# Altium PCB PCB.PcbDoc (part 1 of 10)
Units mm, origin at the board's own origin, x right, y up, seen from the top; angles counter-clockwise.
Board outline 100.5 x 147.95 mm, 6 copper layers (Top Layer, Layer 2 (GND), Layer 3, Layer 4, Layer 5 (AGND), Bottom Layer), stack 1.449 mm thick; 511 components, 297 nets, 1620 pads, 565 vias.
Unrouted connection lines stored in the file: 597.
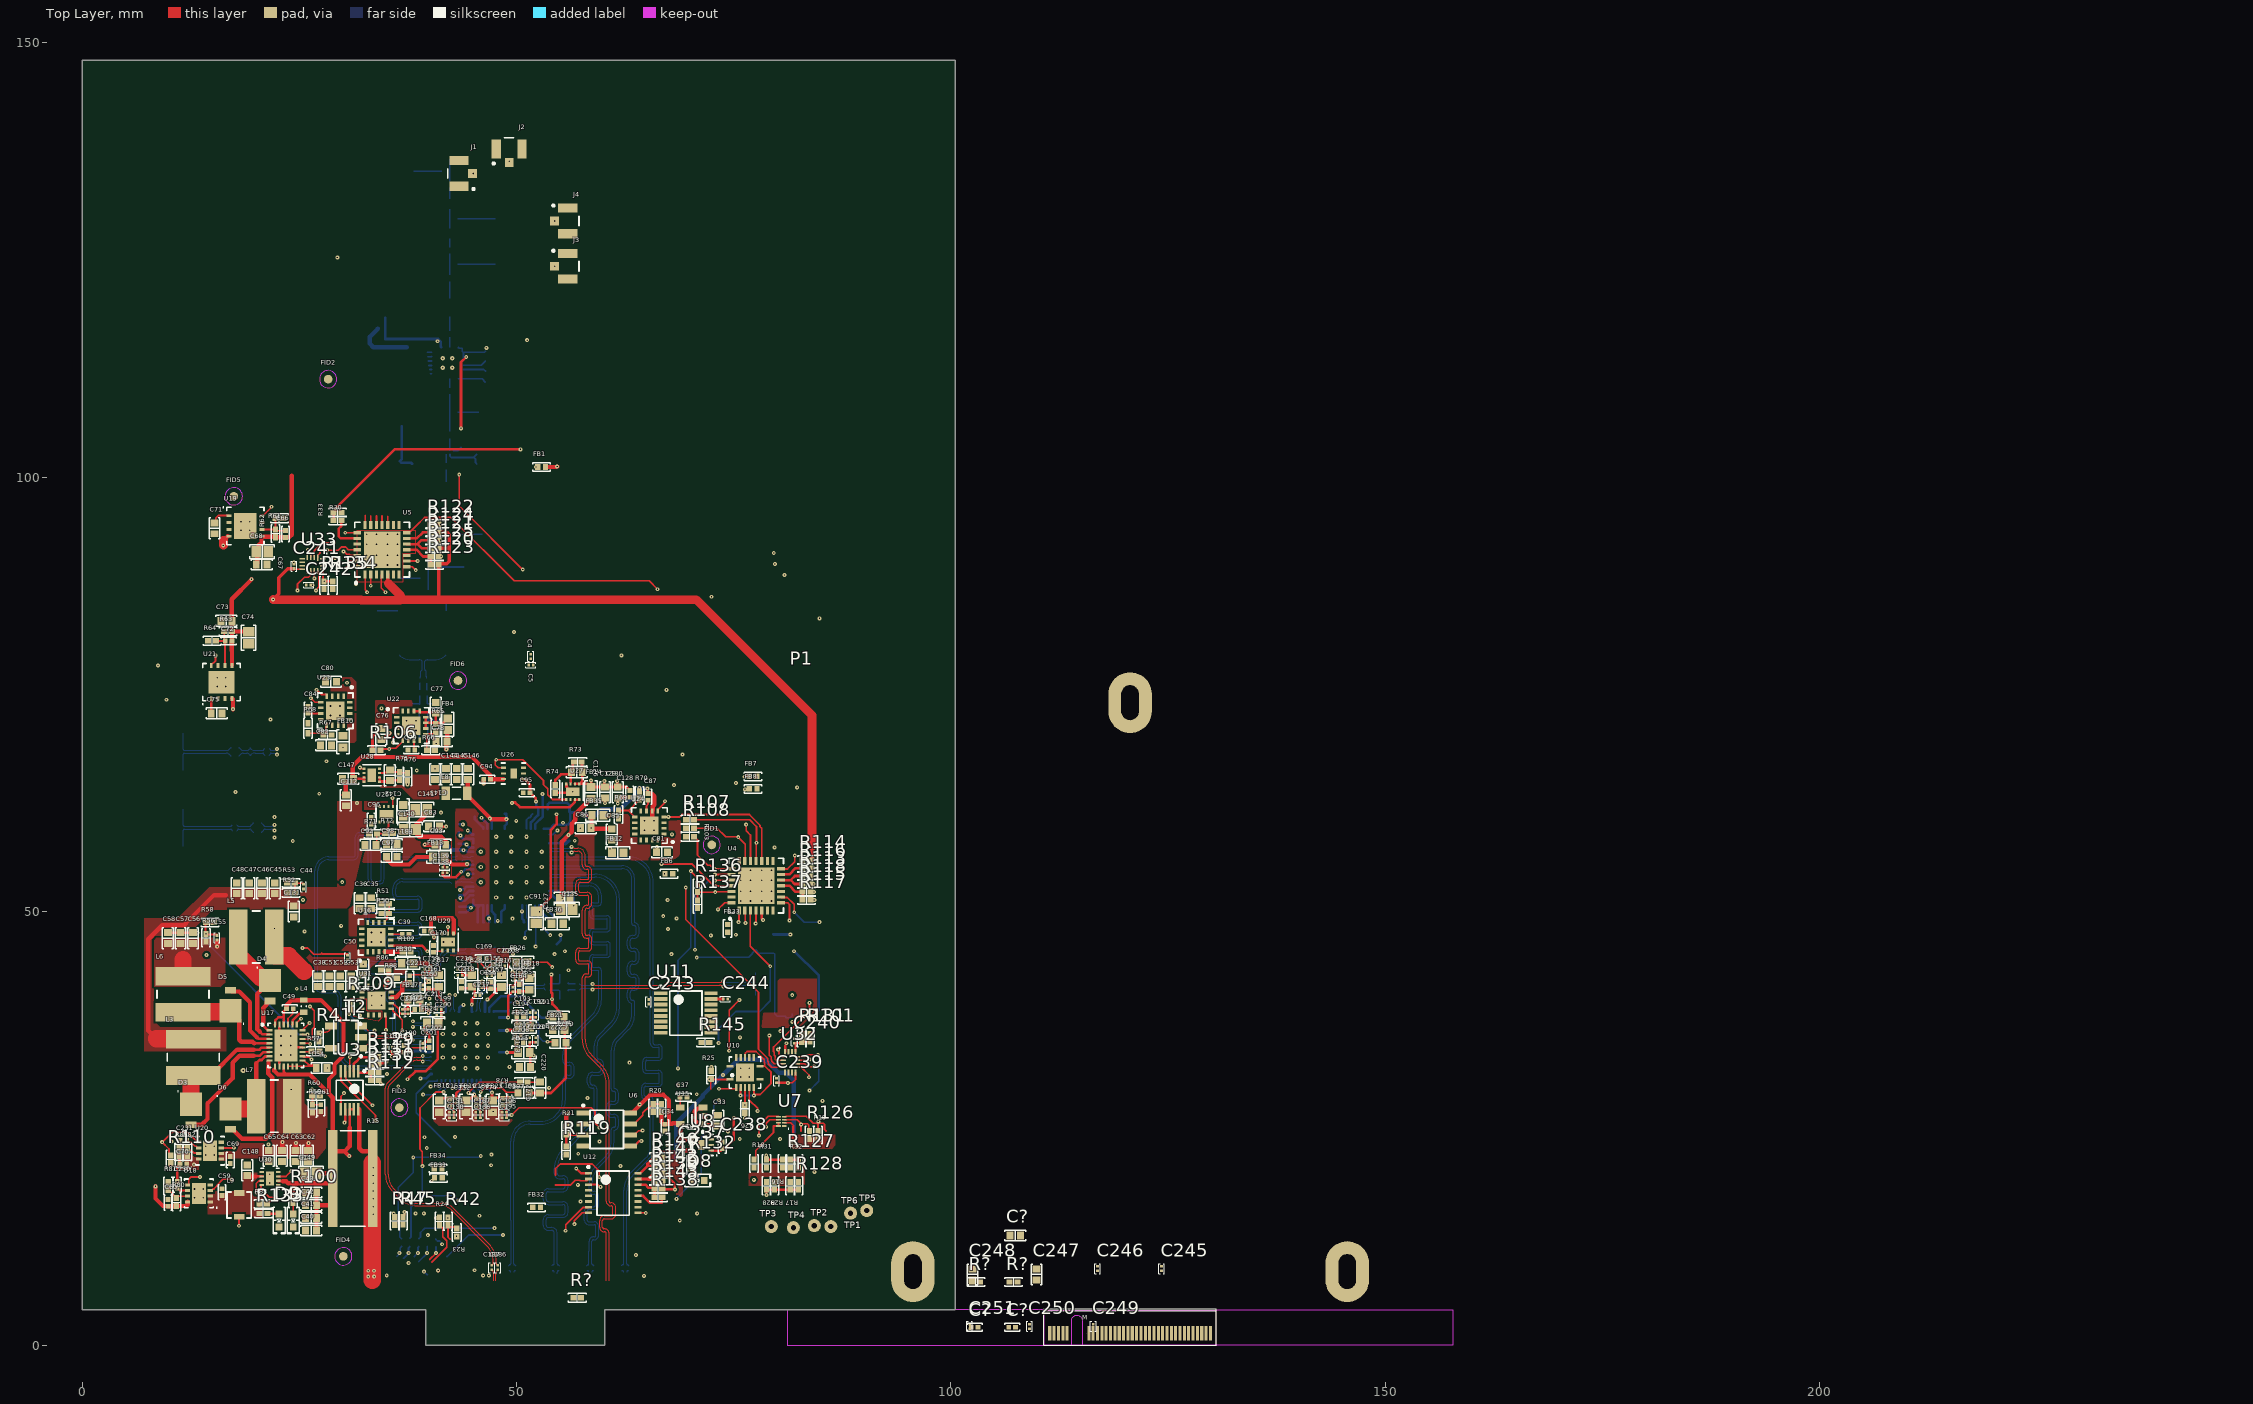
[diagram p0: Top Layer view]
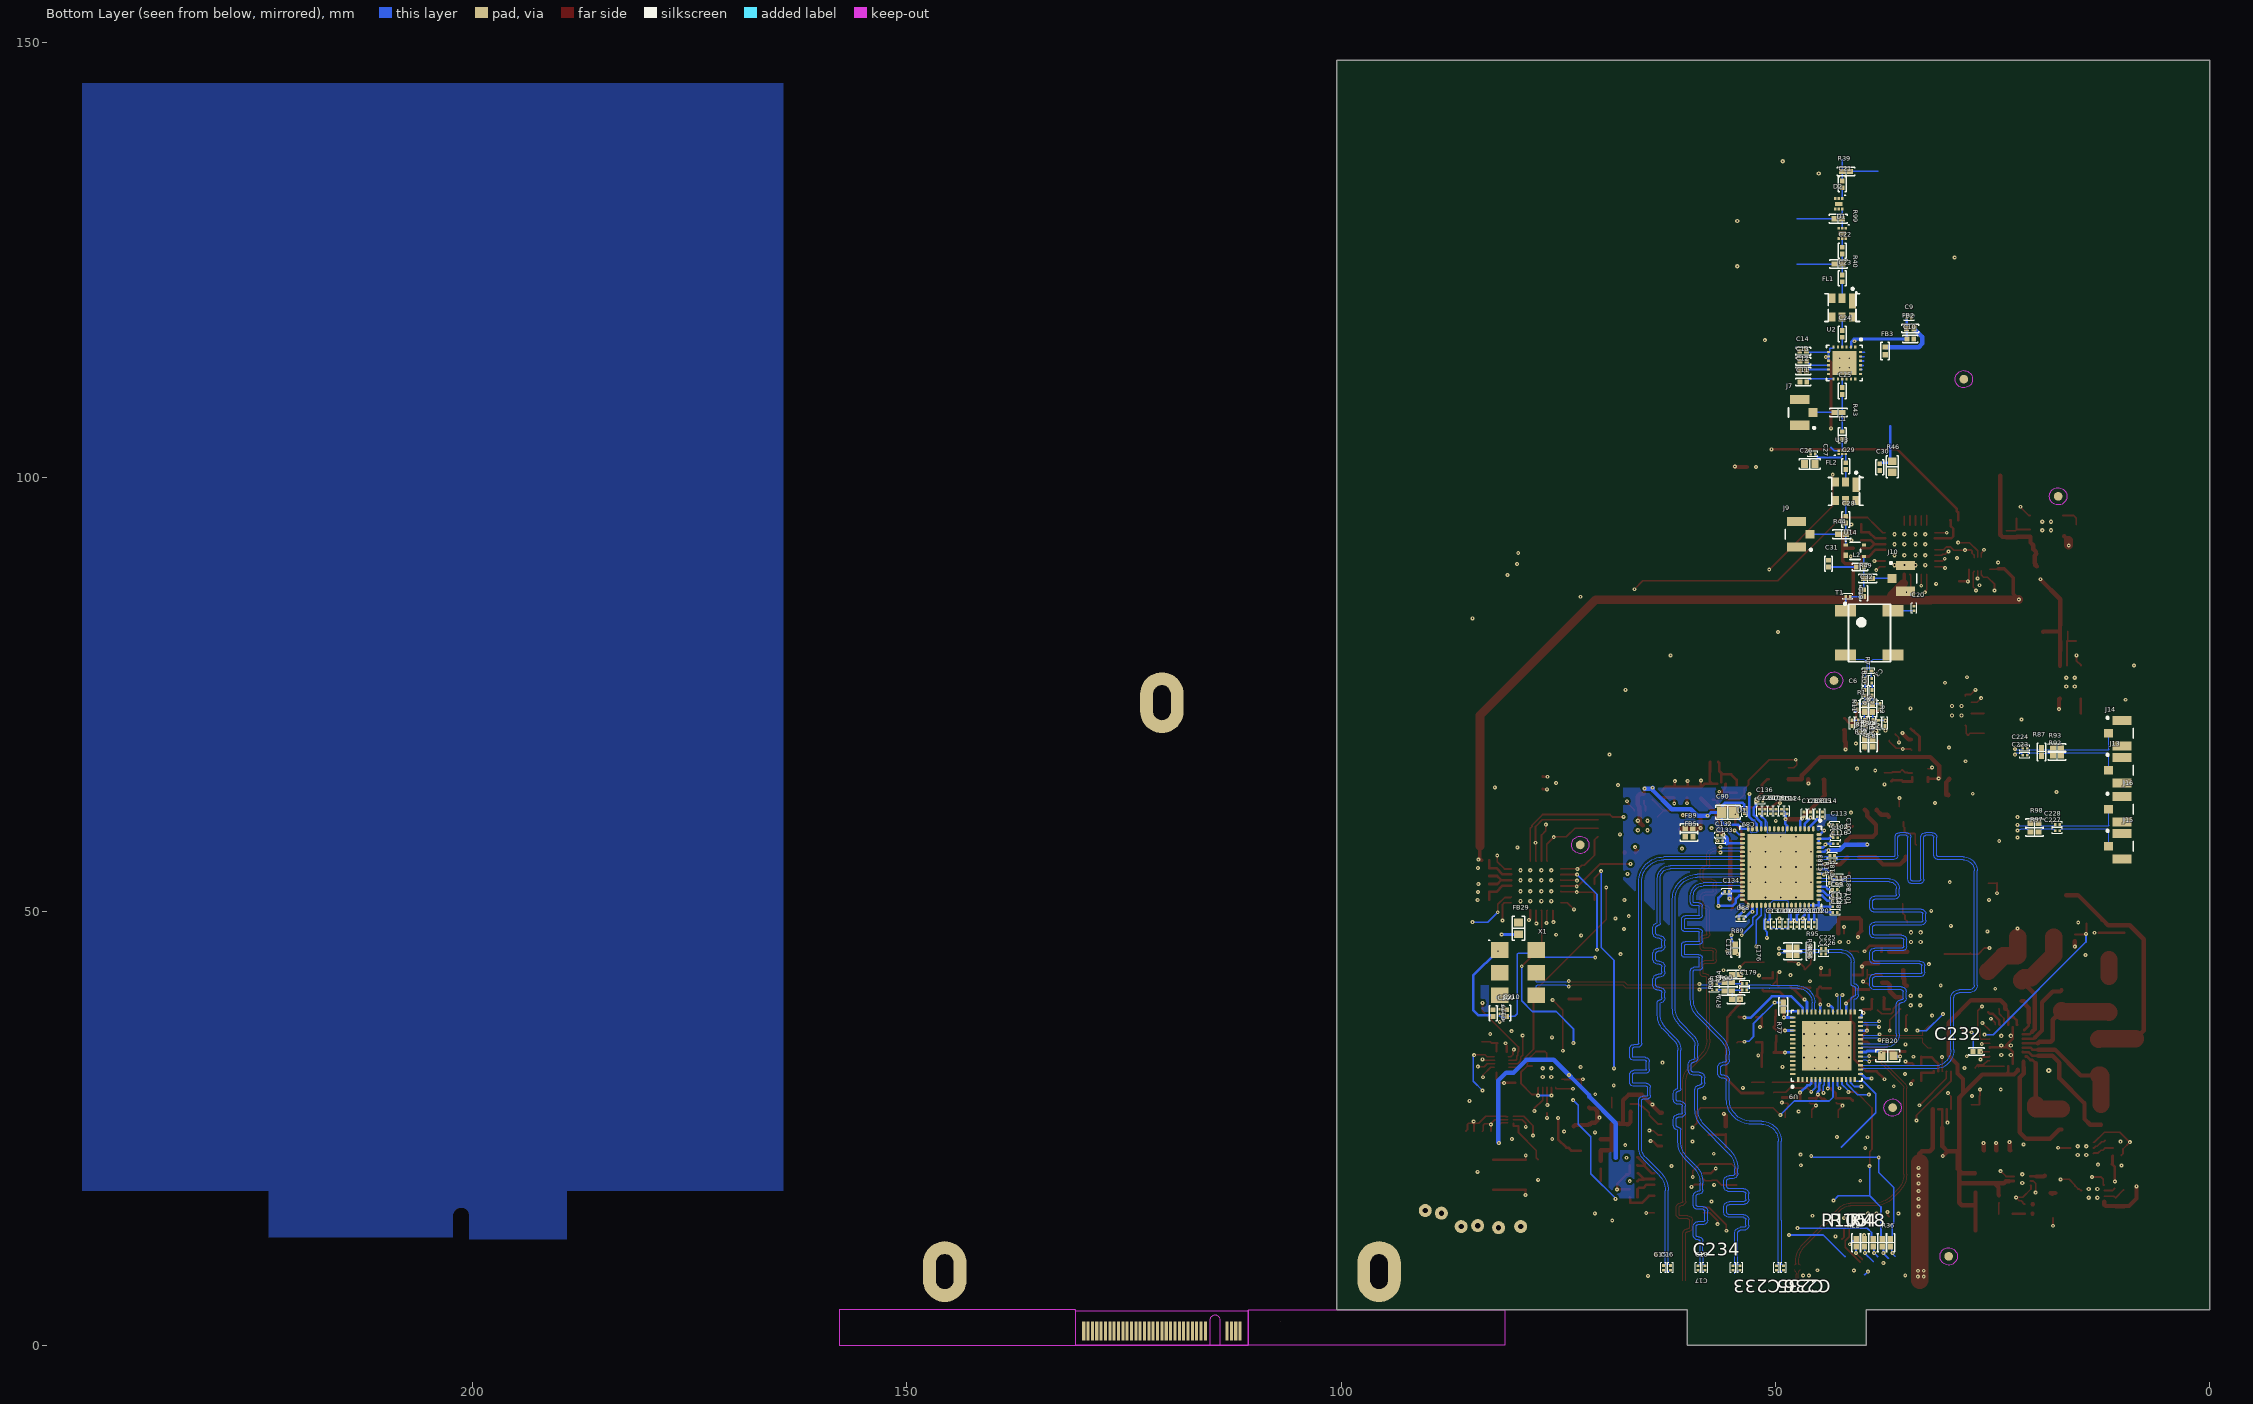
[diagram p1: Bottom Layer view, seen from below]
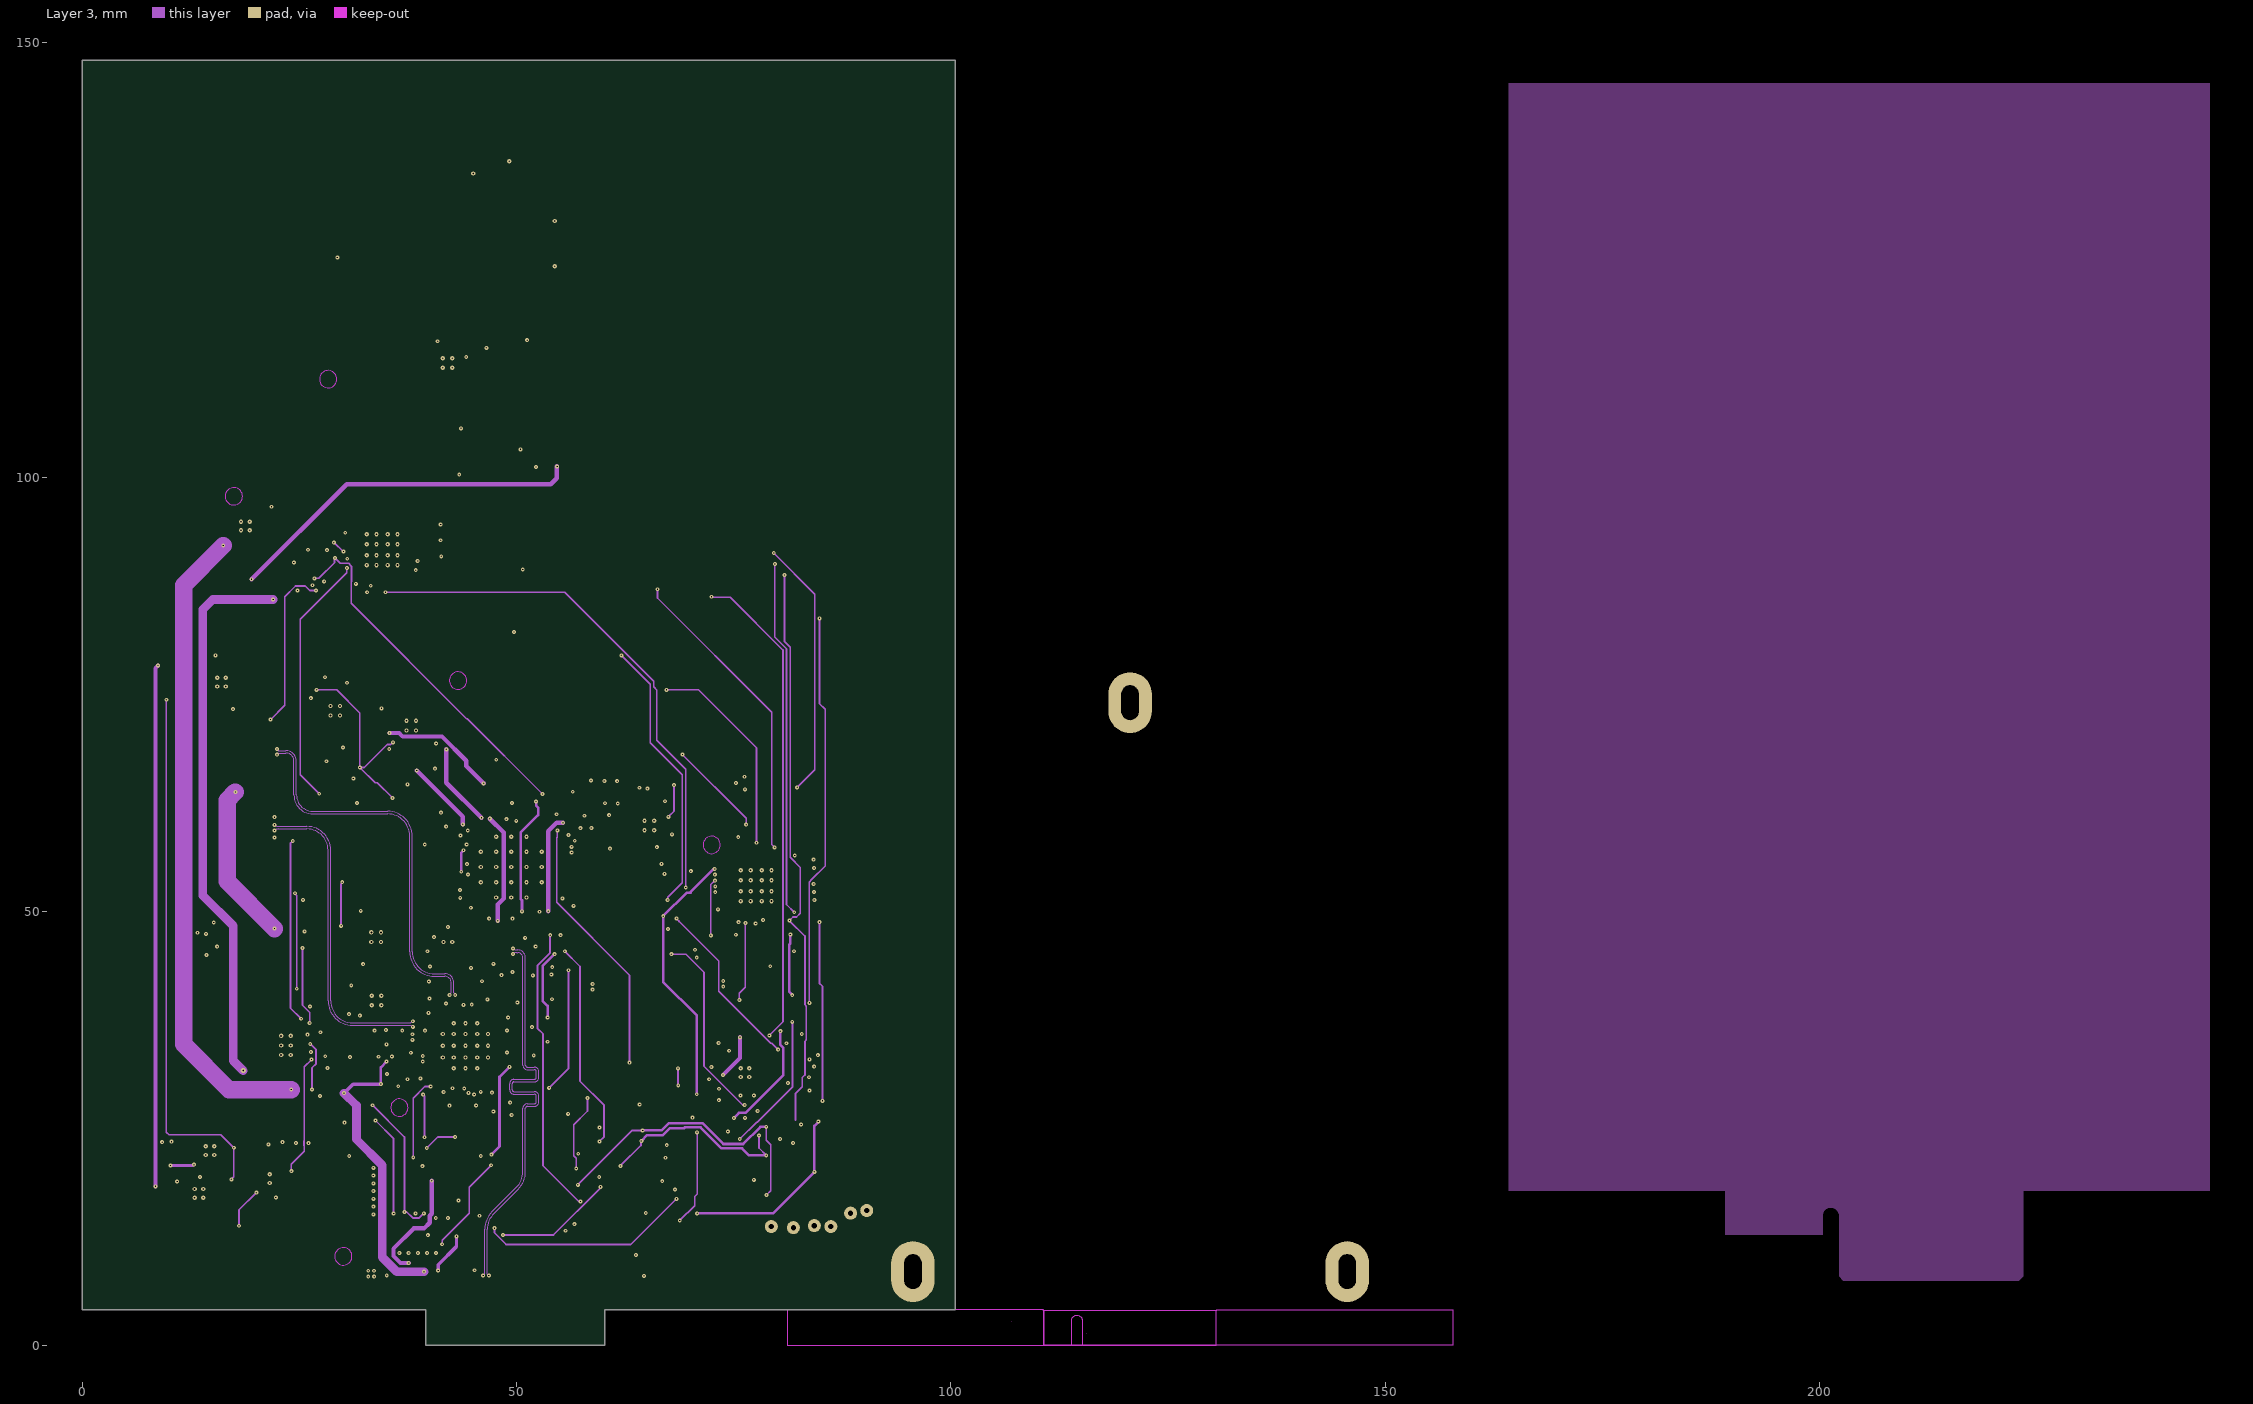
[diagram p2: Layer 3]
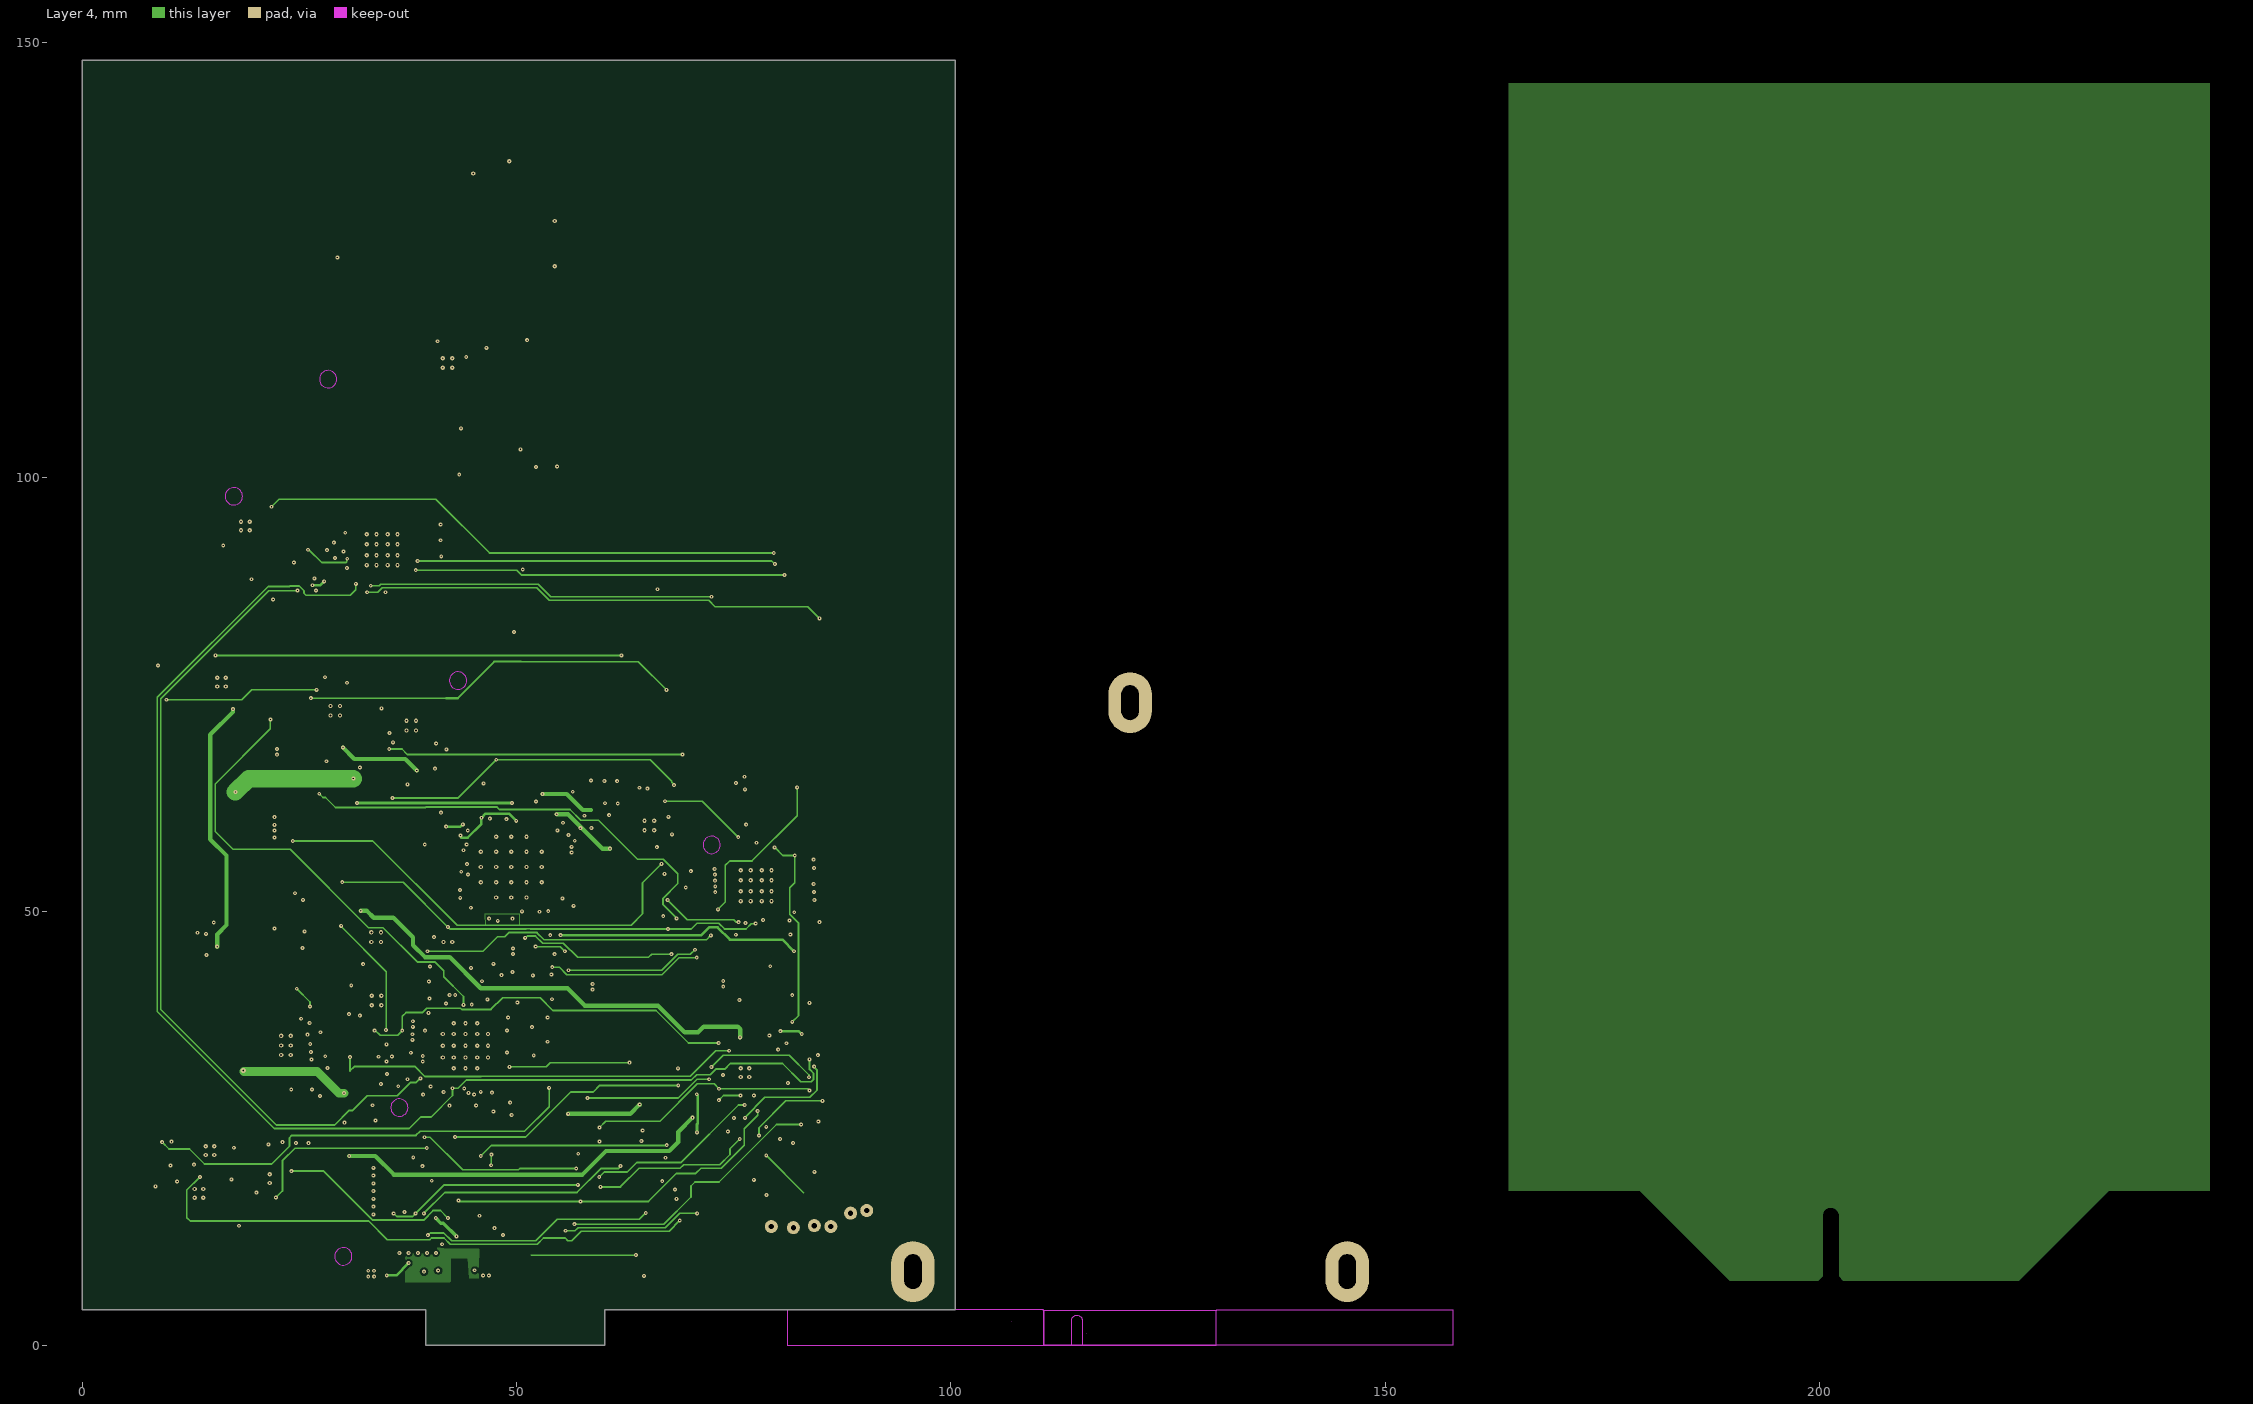
[diagram p3: Layer 4]

## Layer stack, top to bottom
Top Solder: solder mask 0.02, SM-001, Dk 4
Top Layer: signal copper 0.018
Dielectric 1: prepreg 0.105, PP-016, Dk 4.4
Layer 2 (GND): signal copper 0.0044
Dielectric 3: core 0.5, Core-035, Dk 4.7
Layer 3: signal copper 0.0044
Dielectric 5: prepreg 0.185, PP-021, Dk 4.7
Layer 4: signal copper 0.0044
Dielectric 6: core 0.5, Core-035, Dk 4.7
Layer 5 (AGND): signal copper 0.0044
Dielectric 7: prepreg 0.105, PP-016, Dk 4.4
Bottom Layer: signal copper 0.018
Bottom Solder: solder mask 0.02, SM-001, Dk 4

## Board outline
0,148 100.5,148 100.5,4.15 60.171,4.15 60.171,0.05 39.525,0.05 39.525,4.15 0,4.15

## Design rules (kind name [scope] priority, off if disabled: settings)
Clearance [All] p1: gap=0.254 ignorepadtopadclearanceinfootprint=FALSE except(0: Arc-Hole Track-Hole SMDPad-Hole THPad-Hole Via-Hole Fill-Hole Poly-Hole Region-Hole Text-Hole)
DiffPairsRouting [All] p1: maxlimit=0.127 minlimit=0.05 mostfreqgap=0.127 toplayer_mingap=0.127 toplayer_maxgap=0.127 toplayer_minwidth=0.112 toplayer_maxwidth=0.137 toplayer_prefwidth=0.118 midlayer1_prefgap=0.05 midlayer1_minwidth=0.055 midlayer1_maxwidth=0.055 midlayer1_prefwidth=0.055 midlayer2_prefgap=0.05 midlayer2_minwidth=0.055 midlayer2_maxwidth=0.055 midlayer2_prefwidth=0.055 midlayer3_mingap=0.127 midlayer3_maxgap=0.127 midlayer3_minwidth=0.098 midlayer3_maxwidth=0.098 midlayer3_prefwidth=0.098 midlayer4_mingap=0.127 midlayer4_maxgap=0.127 midlayer4_minwidth=0.098 midlayer4_maxwidth=0.098 midlayer4_prefwidth=0.098 bottomlayer_mingap=0.127 bottomlayer_maxgap=0.127 bottomlayer_minwidth=0.112 bottomlayer_maxwidth=0.137 bottomlayer_prefwidth=0.118 substack1={4A79DAF0-92DA-4A0B-BB84-FA68C2F6F527} impedanceprofiledriven=TRUE impedanceprofileid={51EBFF2B-E4F5-483F-9850-5D39397362C8} impedanceprofilevalue=100.000000 maxuncoupledlength=12.7
PlaneConnect [All] p1: planeconnectstyle=Direct reliefexpansion=0.508 reliefentries=4 reliefconductorwidth=0.254 reliefairgap=0.254
PolygonConnect [All] p1: connectstyle=Direct reliefconductorwidth=0.254 reliefentries=4 polygonreliefangle="90 Angle" airgapwidth=0.254
RoutingVias [All] p1: holewidth=0.711 width=1.27 viastyle="Through Hole" minholewidth=0.711 minwidth=1.27 maxholewidth=0.711 maxwidth=1.27
SolderMaskExpansion [All] p1: expansion=0.102 istentingtop=FALSE
Width [All] p1: maxlimit=0.254 minlimit=0.254 preferedwidth=0.254
28 further rules are at their usual default settings.

## Classes and differential pairs
differential pair class Diff100: ADC_CLK9690 AN_IN AN_IN_9690 CLKin0 CLKin0_1 CLKin1 CLKin1_1 CLKout1 CLKout2 CLKout3 CLKout4 CLKout5 LMK_CLKin0 LMK_CLKin1 O1 O2 O5 O5P OSCIN VCXO_OUT
differential pair class Diff100CtoConn: O2 PER0 PER1 PER2 PER3 PET1 PET2 PET3
differential pair class Diff100ADCtoC: CMLout1 CMLout2 CMLout3 CMLout4
net class Single50Ohm: AGND AN_IN_N AN_IN_P CLKin0_1_N CLKin0_1_P CLKin0_N CLKin0_P CLKin1_1_N CLKin1_1_P LMK_CLKin0_N LMK_CLKin0_P LMK_CLKin1_N LMK_CLKin1_P NetC1_1 NetC2_1 NetC3_2 NetC4_2 NetC5_1 NetC5_2 NetC6_2 NetC7_2 NetC8_2 NetC21_1 NetC21_2 NetC22_1 NetC22_2 NetC23_2 NetC24_1 NetC24_2 NetC25_1 NetC25_2 NetC28_1 NetC28_2 NetC29_1 NetC29_2 NetC32_2 NetC175_2 NetC176_1 NetC178_2 NetC179_1 NetC209_2 NetC232_1 NetC232_2 NetD1_2 NetJ1_2 NetJ3_2 NetJ4_2 NetJ7_2 NetJ9_2 NetJ10_2 NetL1_1 NetR1_2 NetR9_1 Tor_RF_50 TorRF_50 TorRF_50_1 VCXO_OUT_N VCXO_OUT_P
net class JTAG[1..5]: JTAG1 JTAG2 JTAG3 JTAG4 JTAG5
net class Dlugosc: CMLout1_N CMLout1_P CMLout2_N CMLout2_P CMLout3_N CMLout3_P CMLout4_N CMLout4_P
net class Dlugosc_sync: PET3_N PET3_P
net class Dlugosc_3: CLKout2_N CLKout3_N CLKout3_P
net class Dlugosc_2: LMK_CLKin1_N LMK_CLKin1_P
net class Dlugosc_1: CLKin1_N CLKin1_P
net class Dlugosc4: CLKout1_N CLKout1_P CLKout2_P
net class CtoConn: O2_N O2_P PER0_N PER0_P PER1_N PER1_P PER2_N PER2_P PER3_N PER3_P PET1_N PET1_P PET2_N PET2_P PET3_N PET3_P
net class CLKDisToC: CLKout1_N CLKout1_P CLKout2_N CLKout2_P CLKout3_N CLKout3_P CLKout5_N CLKout5_P
net class CLK_Out: CLKout1_N CLKout1_P CLKout2_N CLKout2_P CLKout3_N CLKout3_P CLKout5_N CLKout5_P
net class CLK_O: ADC_CLK9690_N ADC_CLK9690_P O1_N O1_P O2_N O2_P O5_N O5_P
net class CLK_IN2: LMK_CLKin0_N LMK_CLKin0_P LMK_CLKin1_N LMK_CLKin1_P
net class CLK_IN1: CLKin0_N CLKin0_P CLKin1_N CLKin1_P
net class Ain: AN_IN_9690_N AN_IN_9690_P
net class ADC_CLK: ADC_CLK9690_N ADC_CLK9690_P O1_N O1_P O2_N O2_P O5_N O5_P
component class U_Zegar: C171 C172 C173 C175 C176 C177 C178 C179 C183 C185 C186 C187 C188 C189 C222 C223 C224 C225 C226 C227 C228 C232 FB21 J13 J14 J15 J16 R41 R77 R78 R79 R84 R87 R89 R90 R91 R92 R93 R94 R95 R96 R97 R98 T2 X1
component class U_Zasilanie: C33 C34 C35 C36 C37 C38 C39 C40 C41 C42 C43 C45 C46 C47 C48 C49 C51 C52 C53 C54 C55 C56 C57 C58 C59 C60 C61 C62 C63 C64 C65 C66 C67 C68 C69 C70 C71 C72 C73 C74 C75 C148 C149 C230 C231 C237 C238 C245 C246 C247 C248 D3 D4 D5 D6 D7 D8 D9 FB31 FB32 FB33 FB34 L3 L4 L5 L6 L7 L9 R50 R51 R52 R53 R56 R57 R58 R59 R60 R61 R62 R63 R64 R80 R81 R82 R85 R100 R102 R103 R110 R132 R133 R? U8 U15 U16 U17 U18 U19 U20 U21 U30
component class U_Zasilanie_LMK: C150 C151 C152 C153 C154 C155 C156 C157 C158 C159 C160 C161 C162 C163 C164 C165 C166 C167 C168 C169 C170 C174 C180 C181 C182 C184 C190 C191 C192 C193 C194 C195 C196 C197 C198 C199 C200 C201 C202 C203 C204 C205 C206 C207 C208 C209 C210 C211 C212 C213 C214 C215 C216 C217 C218 C219 C220 C221 C? FB15 FB16 FB17 FB18 FB19 FB20 FB22 FB23 FB24 FB25 FB26 FB27 FB28 FB29 FB30 R86 R88 R109 R? U9 U29 U31
component class U_Zasilanie_ADC: C76 C77 C78 C79 C80 C81 C82 C83 C84 C85 C86 C87 C88 C89 C90 C91 C92 C93 C94 C95 C96 C97 C98 C99 C100 C101 C102 C103 C104 C105 C106 C107 C108 C109 C110 C111 C112 C113 C114 C115 C116 C117 C118 C119 C120 C121 C122 C123 C124 C125 C126 C127 C128 C129 C130 C131 C132 C133 C134 C135 C136 C137 C138 C139 C140 C141 C142 C143 C144 C145 C146 C147 C229 FB4 FB5 FB6 FB7 FB8 FB9 FB10 FB11 FB12 FB13 FB14 FB35 FB36 L8 R32 R65 R66 R67 R68 R69 R70 R71 R72 R73 R74 R75 R76 R106 R107 R108 U1 U22 U23 U24 U25 U26 U27 U28
component class U_Tor: C19 C20 FB1 FB2 FB3 T1
component class U_TorGnss: C23 C24 C25 C26 C27 C28 C29 C30 C31 C32 FL1 FL2 J7 J9 J10 L1 L2 R43 R44 R46 R49 U13 U14
component class "U_Tor antenowy": C21 C22 D1 D2 J1 J2 J3 J4 R39 R40 R99
component class "U_Pomiar prądu i napięcia": C44 R15 R83 R111 R112 R129 R130 U3
component class U_Komunikacja: C15 C16 C17 C18 C233 C234 C235 C236 C243 C244 C249 C250 C251 R16 R17 R18 R19 R22 R23 R24 R25 R26 R28 R29 R31 R36 R42 R45 R47 R48 R104 R105 R126 R127 R128 R138 R139 R140 R141 R142 R143 R145 TP1 TP2 TP3 TP4 TP5 TP6 U7 U10 U11 U12
component class U_Flash: C50 R20 R21 R27 R119 U6
component class U_Expander: C239 C240 C241 C242 C? R30 R33 R101 R113 R114 R115 R116 R117 R118 R120 R121 R122 R123 R124 R125 R131 R134 R135 R136 R137 U4 U5 U32 U33
component class U_CON_PCI_Express_X4_64PIN: P1
component class U_ATT: C9 C10 C11 C12 C13 C14 U2
component class U_ADC: C1 C2 C3 C4 C5 C6 C7 C8 R1 R2 R3 R4 R5 R6 R7 R8 R9 R10 R11 R12 R13 R14
component class Karta_Radiowa: FID1 FID2 FID3 FID4 FID5 FID6
net class Diff100: ADC_CLK9690_N ADC_CLK9690_P AGND AN_IN_9690_N AN_IN_9690_P AN_IN_N AN_IN_P CLKin0_N CLKin0_P CLKin1_N CLKin1_P CLKout1_N CLKout1_P CLKout2_N CLKout2_P CLKout3_N CLKout3_P CLKout4_N CLKout4_P CLKout5_N CLKout5_P LMK_CLKin0_N LMK_CLKin0_P LMK_CLKin1_N LMK_CLKin1_P LMK_CLKsel NetC209_2 O1_N O1_P O2_N O2_P O5_N O5_P O5P_N O5P_P OSCIN_N OSCIN_P VCXO_OUT_N VCXO_OUT_P
net class Power_LINE: 1.8V_SPI_ADC 5V 12V 4610_FINE_V 9690_AGND_SR +12V AGND AVDD1_1.25V AVDD1_SR_1.25V AVDD2_2.5V AVDD3_3.3V CLK_GND CTRL_VCXO DGND DRGND DRVDD_1.25V DVDD_1.25V GND GND_VCXO NetC66_2 NetC72_2 NetC77_2 NetC82_2 NetC85_2 NetC92_2 NetC126_2 NetC142_2 NetC177_2 NetC209_2 NetC219_2 NetD3_1 NetD3_2 NetD4_1 NetD4_2 NetD5_1 NetD5_2 NetD6_1 NetD6_2 V2.5 V3.7 V5.5 V_LMK_1.8V VCC VCC_5_ATT VCC_AMP_5 VCC_PCA VDD_CORE VDD_IO VDD_OSC VDD_PLL1 VDD_PLL2CORE VDD_PLL2OSC VDDO_1/2 VDDO_3/4 VDDO_5 VDDO_6 VDDO_7/8 VDDO_9/10 VP3.3 Vsup_ADC1 Vsup_ADC2
differential pair VCXO_OUT: +VCXO_OUT_P -VCXO_OUT_N
differential pair PET3: +PET3_P -PET3_N
differential pair PET2: +PET2_P -PET2_N
differential pair PET1: +PET1_P -PET1_N
differential pair PER3: +PER3_P -PER3_N
differential pair PER2: +PER2_P -PER2_N
differential pair PER1: +PER1_P -PER1_N
differential pair PER0: +PER0_P -PER0_N
differential pair OSCIN: +OSCIN_P -OSCIN_N
differential pair O5: +O5_P -O5_N
differential pair O5P: +O5P_P -O5P_N
differential pair O2: +O2_P -O2_N
differential pair O1: +O1_P -O1_N
differential pair LMK_CLKin1: +LMK_CLKin1_P -LMK_CLKin1_N
differential pair LMK_CLKin0: +LMK_CLKin0_P -LMK_CLKin0_N
differential pair CMLout4: +CMLout4_P -CMLout4_N
differential pair CMLout3: +CMLout3_P -CMLout3_N
differential pair CMLout2: +CMLout2_P -CMLout2_N
differential pair CMLout1: +CMLout1_P -CMLout1_N
differential pair CLKout5: +CLKout5_P -CLKout5_N
differential pair CLKout4: +CLKout4_P -CLKout4_N
differential pair CLKout3: +CLKout3_P -CLKout3_N
differential pair CLKout2: +CLKout2_P -CLKout2_N
differential pair CLKout1: +CLKout1_P -CLKout1_N
differential pair CLKin1: +CLKin1_P -CLKin1_N
differential pair CLKin1_1: +CLKin1_1_P -CLKin1_1_N
differential pair CLKin0: +CLKin0_P -CLKin0_N
differential pair CLKin0_1: +CLKin0_1_P -CLKin0_1_N
differential pair AN_IN: +AN_IN_P -AN_IN_N
differential pair AN_IN_9690: +AN_IN_9690_P -AN_IN_9690_N
differential pair ADC_CLK9690: +ADC_CLK9690_P -ADC_CLK9690_N

## Components (designator, comment, footprint, x,y, rotation, side; value= is the part's Value field where it differs from the comment)
C1 "4pF" "CAP 0201/0603 RF" 38.072,71.786 r270 bottom
C2 "1pF" "CAP 0201/0603 RF" 38.529,70.674 r180 bottom
C3 "100nF" "CAP 0201/0603 RF" 38.91,76.573 r270 bottom
C4 "100nF" "CAP 0201/0603 RF" 51.625,79.385 r90 top
C5 "1pF" "CAP 0201/0603 RF" 51.64,78.375 r180 top
C6 "100nF" "CAP 0201/0603 RF" 39.647,76.573 r270 bottom
C7 "4pF" "CAP 0201/0603 RF" 40.46,71.792 r90 bottom
C8 "1pF" "CAP 0201/0603 RF" 40.002,70.674 r180 bottom
C9 "100nF" "CAP 0201/0603 RF" 34.596,118.336 r0 bottom
C10 "10uF" "CAP 0402/1005 RF" 34.468,115.911 r0 bottom
C11 "330pF" "CAP 0402/1005 RF" 46.787,110.958 r0 bottom
C12 "330pF" "CAP 0402/1005 RF" 46.796,112.228 r0 bottom
C13 "330pF" "CAP 0402/1005 RF" 46.787,113.371 r0 bottom
C14 "330pF" "CAP 0402/1005 RF" 46.796,114.514 r0 bottom
C15 "100nF" "CAP 0201/0603 RF" 62.889,8.988 r270 bottom
C16 "100nF" "CAP 0201/0603 RF" 62.076,8.988 r270 bottom
C17 "100nF" "CAP 0201/0603 RF" 58.901,8.982 r270 bottom
C18 "100nF" "CAP 0201/0603 RF" 58.088,8.982 r270 bottom
C19 "100nF" "CAP 0201/0603 RF" 41.648,86.271 r0 bottom
C20 "100nF" "CAP 0201/0603 RF" 34.033,84.898 r270 bottom
C21 "22pF" "CAP 0402/1005 RF" 42.307,133.716 r270 bottom
C22 "22pF" "CAP 0402/1005 RF" 42.308,126.093 r270 bottom
C23 "33pF" "CAP 0402/1005 RF" 42.308,122.896 r270 bottom
C24 "33pF" "CAP 0402/1005 RF" 42.3,116.499 r270 bottom
C25 "33pF" "CAP 0402/1005 RF" 42.3,109.933 r270 bottom
C26 "2.2uF" "CAP 0603/1608 RF" 46.037,101.52 r180 bottom
C27 "100nF" "CAP 0201/0603 RF" 45.678,102.662 r180 bottom
C28 "33pF" "CAP 0402/1005 RF" 41.9,95.133 r90 bottom
C29 "33pF" "CAP 0402/1005 RF" 41.908,101.272 r90 bottom
C30 "33pF" "CAP 0402/1005 RF" 37.973,101.154 r90 bottom
C31 "33pF" "CAP 0402/1005 RF" 43.875,90.056 r270 bottom
C32 "33pF" "CAP 0402/1005 RF" 39.808,86.661 r90 bottom
C33 "1uF" "CAP 0603/1608 RF" 73.201,25.923 r270 top
C34 "2.2uF" "CAP 0402/1005 RF" 67.08,25.136 r90 top
C35 "4.7uF" "CAP 0603/1608 RF" 33.272,50.968 r270 top
C36 "4.7uF" "CAP 0603/1608 RF" 31.926,50.968 r270 top
C37 "100pF" "CAP 0402/1005 RF" 69.212,28.62 r180 top
C38 "4.7uF" "CAP 0603/1608 RF" 27.131,41.977 r90 top
C39 "1nF" "CAP 0402/1005 RF" 37.209,47.386 r180 top
C40 "4.7uF" "CAP 0603/1608 RF" 26.339,13.281 r180 top
C41 "4.7uF" "CAP 0603/1608 RF" 26.339,14.739 r180 top
C42 "4.7uF" "CAP 0603/1608 RF" 26.339,16.191 r180 top
C43 "4.7uF" "CAP 0603/1608 RF" 26.339,17.653 r180 top
C44 "100nF" "CAP 0201/0603 RF" 25.474,52.864 r270 top
C45 "4.7uF" "CAP 0603/1608 RF" 22.146,52.686 r270 top
C46 "4.7uF" "CAP 0603/1608 RF" 20.68,52.686 r270 top
C47 "4.7uF" "CAP 0603/1608 RF" 19.214,52.686 r270 top
C48 "4.7uF" "CAP 0603/1608 RF" 17.776,52.686 r270 top
C49 "1uF" "CAP 0402/1005 RF" 23.886,38.801 r180 top
C50 "100nF" "CAP 0201/0603 RF" 30.516,44.712 r270 top
C51 "4.7uF" "CAP 0603/1608 RF" 28.446,41.976 r90 top
C52 "4.7uF" "CAP 0603/1608 RF" 29.691,41.976 r90 top
C53 "4.7uF" "CAP 0603/1608 RF" 30.961,41.976 r90 top
C54 "100nF" "CAP 0603/1608 RF" 27.557,31.994 r180 top
C55 "82pF" "CAP 0201/0603 RF" 15.5,46.982 r270 top
C56 "4.7uF" "CAP 0603/1608 RF" 12.747,46.941 r270 top
C57 "4.7uF" "CAP 0603/1608 RF" 11.308,46.941 r270 top
C58 "4.7uF" "CAP 0603/1608 RF" 9.847,46.941 r270 top
C59 "4.7uF" "CAP 0402/1005 RF" 16.074,17.698 r270 top
C60 "4.7uF" "CAP 0402/1005 RF" 9.865,16.466 r270 top
C61 "22pF" "CAP 0402/1005 RF" 27.448,27.38 r270 top
C62 "4.7uF" "CAP 0603/1608 RF" 25.979,21.869 r90 top
C63 "4.7uF" "CAP 0603/1608 RF" 24.539,21.869 r90 top
C64 "4.7uF" "CAP 0603/1608 RF" 22.976,21.869 r90 top
C65 "4.7uF" "CAP 0603/1608 RF" 21.459,21.869 r90 top
C66 "680pF" "CAP 0402/1005 RF" 23.387,93.465 r270 top
C67 "1uF" "CAP 0603/1608 RF" 20.648,89.957 r180 top
C68 "10uF" "CAP 0805/2012 RF" 20.699,91.43 r180 top
C69 "4.7uF" "CAP 0402/1005 RF" 17.03,21.4 r90 top
C70 "4.7uF" "CAP 0402/1005 RF" 11.637,20.932 r0 top
C71 "10nF" "CAP 0603/1608 RF" 15.213,94.122 r90 top
C72 "1.5nF" "CAP 0402/1005 RF" 16.845,81.14 r0 top
C73 "4.7uF" "CAP 0603/1608 RF" 16.585,83.464 r0 top
C74 "10uF" "CAP 0805/2012 RF" 19.15,81.519 r90 top
C75 "10nF" "CAP 0603/1608 RF" 15.467,72.812 r180 top
C76 "4.7uF" "CAP 0603/1608 RF" 34.427,70.429 r90 top
C77 "4.7uF" "CAP 0603/1608 RF" 40.694,73.454 r270 top
C78 "4.7uF" "CAP 0603/1608 RF" 41.361,69.58 r0 top
C79 "1nF" "CAP 0402/1005 RF" 37.878,68.607 r0 top
C80 "4.7uF" "CAP 0603/1608 RF" 28.621,76.463 r0 top
C81 "4.7uF" "CAP 0603/1608 RF" 66.734,56.835 r180 top
C82 "4.7uF" "CAP 0603/1608 RF" 28.065,69.136 r0 top
C83 "4.7uF" "CAP 0603/1608 RF" 40.496,59.807 r0 top
C84 "1nF" "CAP 0402/1005 RF" 25.982,73.218 r270 top
C85 "4.7uF" "CAP 0603/1608 RF" 60.958,58.867 r270 top
C86 "4.7uF" "CAP 0603/1608 RF" 57.961,59.604 r180 top
C87 "1nF" "CAP 0402/1005 RF" 65.124,63.211 r270 top
C88 "100nF" "CAP 0201/0603 RF" 53.922,49.139 r180 bottom
C89 "100nF" "CAP 0201/0603 RF" 53.567,61.515 r270 bottom
C90 "10uF" "CAP 0805/2012 RF" 55.461,61.433 r180 bottom
C91 "10uF" "CAP 0805/2012 RF" 52.246,49.342 r90 top
C92 "2.2nF" "CAP 0603/1608 RF" 33.171,57.673 r180 top
C93 "4.7uF" "CAP 0603/1608 RF" 41.212,57.699 r0 top
C94 "470nF" "CAP 0402/1005 RF" 46.607,65.249 r0 top
C95 "470nF" "CAP 0402/1005 RF" 51.154,63.693 r0 top
C96 "1uF" "CAP 0402/1005 RF" 33.266,60.467 r270 top
C97 "10uF" "CAP 0603/1608 RF" 35.623,56.319 r180 top
C98 "4.7uF" "CAP 0603/1608 RF" 35.623,57.775 r180 top
C99 "100nF" "CAP 0201/0603 RF" 43.147,51.857 r0 bottom
C100 "100nF" "CAP 0201/0603 RF" 43.057,59.121 r0 bottom
C101 "100nF" "CAP 0201/0603 RF" 43.121,51.222 r0 bottom
C102 "100nF" "CAP 0201/0603 RF" 43.057,58.486 r0 bottom
C103 "100nF" "CAP 0201/0603 RF" 45.947,61.197 r270 bottom
C104 "100nF" "CAP 0201/0603 RF" 49.3,61.527 r270 bottom
C105 "100nF" "CAP 0201/0603 RF" 49.935,61.527 r270 bottom
C106 "100nF" "CAP 0201/0603 RF" 50.57,61.527 r270 bottom
C107 "100nF" "CAP 0201/0603 RF" 51.205,61.527 r270 bottom
C108 "100nF" "CAP 0201/0603 RF" 48.868,48.523 r90 bottom
C109 "100nF" "CAP 0201/0603 RF" 49.528,48.523 r90 bottom
C110 "100nF" "CAP 0201/0603 RF" 50.189,48.523 r90 bottom
C111 "100nF" "CAP 0201/0603 RF" 46.861,48.523 r90 bottom
C112 "4.7uF" "CAP 0603/1608 RF" 30.343,62.805 r270 top
C113 "100nF" "CAP 0201/0603 RF" 43.147,60.036 r0 bottom
C114 "100nF" "CAP 0201/0603 RF" 44.587,61.197 r270 bottom
C115 "100nF" "CAP 0201/0603 RF" 45.185,61.197 r270 bottom
C116 "100nF" "CAP 0201/0603 RF" 43.083,57.8 r0 bottom
C117 "100nF" "CAP 0201/0603 RF" 43.127,50.561 r0 bottom
C118 "100nF" "CAP 0201/0603 RF" 43.147,52.543 r0 bottom
C119 "100nF" "CAP 0201/0603 RF" 46.201,48.523 r90 bottom
C120 "100nF" "CAP 0201/0603 RF" 45.515,48.523 r90 bottom
C121 "100nF" "CAP 0201/0603 RF" 43.121,49.901 r0 bottom
C122 "100nF" "CAP 0201/0603 RF" 48.207,48.523 r90 bottom
C123 "100nF" "CAP 0201/0603 RF" 47.547,48.523 r90 bottom
C124 "100nF" "CAP 0201/0603 RF" 48.665,61.527 r270 bottom
C125 "100nF" "CAP 0201/0603 RF" 46.709,61.197 r270 bottom
C126 "2.2nF" "CAP 0603/1608 RF" 56.94,66.039 r0 top
C127 "4.7uF" "CAP 0603/1608 RF" 55.533,51.577 r180 top
C128 "1uF" "CAP 0402/1005 RF" 63.041,63.55 r90 top
C129 "10uF" "CAP 0603/1608 RF" 60.173,63.718 r90 top
C130 "4.7uF" "CAP 0603/1608 RF" 61.637,63.718 r90 top
C131 "4.7uF" "CAP 0603/1608 RF" 24.331,50.003 r90 top
C132 "100nF" "CAP 0201/0603 RF" 56.406,58.791 r180 bottom
C133 "100nF" "CAP 0201/0603 RF" 56.31,58.131 r180 bottom
C134 "100nF" "CAP 0201/0603 RF" 55.573,52.314 r180 bottom
C135 "10uF" "CAP 0805/2012 RF" 55.777,50.231 r180 top
C136 "100nF" "CAP 0201/0603 RF" 51.713,62.703 r0 bottom
C137 "100nF" "CAP 0201/0603 RF" 50.849,48.523 r90 bottom
C138 "100nF" "CAP 0201/0603 RF" 41.75,54.473 r0 top
C139 "100nF" "CAP 0201/0603 RF" 41.75,55.108 r0 top
C140 "10uF" "CAP 0805/2012 RF" 37.717,59.451 r0 top
C141 "10uF" "CAP 0805/2012 RF" 39.013,61.737 r0 top
C142 "2.2nF" "CAP 0603/1608 RF" 35.413,65.695 r270 top
C143 "4.7uF" "CAP 0603/1608 RF" 40.601,65.826 r270 top
C144 "10uF" "CAP 0603/1608 RF" 41.875,65.826 r270 top
C145 "10uF" "CAP 0603/1608 RF" 43.107,65.826 r270 top
C146 "10uF" "CAP 0603/1608 RF" 44.413,65.826 r270 top
C147 "4.7uF" "CAP 0603/1608 RF" 30.603,65.279 r0 top
C148 "22uF" "CAP 0603/1608 RF" 18.997,20.224 r270 top
C149 "10uF" "CAP 0805/2012 RF" 26.313,19.878 r0 top
C150 "100nF" "CAP 0201/0603 RF" 42.527,26.258 r180 top
C151 "100nF" "CAP 0201/0603 RF" 42.527,26.908 r180 top
C152 "100nF" "CAP 0201/0603 RF" 43.027,28.247 r90 top
C153 "10uF" "CAP 0402/1005 RF" 42.267,28.047 r90 top
C154 "100nF" "CAP 0201/0603 RF" 46.856,42.643 r0 top
C155 "100nF" "CAP 0201/0603 RF" 46.856,43.318 r0 top
C156 "100nF" "CAP 0201/0603 RF" 46.01,41.508 r270 top
C157 "10uF" "CAP 0402/1005 RF" 46.994,41.509 r270 top
C158 "100nF" "CAP 0201/0603 RF" 39.7,42.703 r0 top
C159 "100nF" "CAP 0201/0603 RF" 39.7,43.339 r0 top
C160 "100nF" "CAP 0201/0603 RF" 39.207,41.284 r270 top
C161 "10uF" "CAP 0402/1005 RF" 39.9,41.553 r270 top
C162 "100nF" "CAP 0201/0603 RF" 50.039,42.343 r0 top
C163 "100nF" "CAP 0201/0603 RF" 50.039,43.018 r0 top
C164 "100nF" "CAP 0201/0603 RF" 49.545,41.049 r270 top
C165 "10uF" "CAP 0402/1005 RF" 50.299,41.202 r270 top
C166 "100nF" "CAP 0201/0603 RF" 45.576,26.258 r180 top
C167 "100nF" "CAP 0201/0603 RF" 45.575,26.908 r180 top
C168 "10uF" "CAP 0402/1005 RF" 39.749,47.767 r0 top
C169 "10uF" "CAP 0402/1005 RF" 46.125,44.592 r0 top
C170 "1uF" "CAP 0402/1005 RF" 40.435,45.71 r270 top
C171 "10uF" "CAP 0603/1608 RF" 55.04,34.89 r0 top
C172 "10uF" "CAP 0603/1608 RF" 52.703,29.733 r270 top
C173 "10uF" "CAP 0603/1608 RF" 50.798,29.149 r0 top
C174 "100nF" "CAP 0201/0603 RF" 46.091,28.247 r90 top
C175 "100nF" "CAP 0201/0603 RF" 57.023,41.008 r180 bottom
C176 "100nF" "CAP 0201/0603 RF" 53.552,40.968 r180 bottom
C177 "100pF" "CAP 0402/1005 RF" 82.497,38.31 r270 bottom
C178 "100nF" "CAP 0201/0603 RF" 57.023,41.67 r180 bottom
C179 "100nF" "CAP 0201/0603 RF" 53.552,41.704 r180 bottom
C180 "10uF" "CAP 0402/1005 RF" 45.344,28.057 r90 top
C181 "100nF" "CAP 0201/0603 RF" 35.025,34.153 r270 top
C182 "100nF" "CAP 0201/0603 RF" 35.685,34.153 r270 top
C183 "100nF" "CAP 0201/0603 RF" 43.452,55.819 r0 bottom
C184 "100nF" "CAP 0201/0603 RF" 36.295,34.147 r270 top
C185 "100nF" "CAP 0201/0603 RF" 43.452,56.454 r0 bottom
C186 "100nF" "CAP 0201/0603 RF" 47.141,9.007 r270 top
C187 "100nF" "CAP 0201/0603 RF" 47.826,9.007 r270 top
C188 "100nF" "CAP 0201/0603 RF" 42.74,53.228 r0 bottom
C189 "100nF" "CAP 0201/0603 RF" 42.74,53.99 r0 bottom
C190 "10uF" "CAP 0402/1005 RF" 37.031,34.187 r270 top
C191 "100nF" "CAP 0201/0603 RF" 52.195,38.096 r270 top
C192 "100nF" "CAP 0201/0603 RF" 51.56,38.115 r270 top
C193 "100nF" "CAP 0201/0603 RF" 50.22,38.649 r180 top
C194 "10uF" "CAP 0402/1005 RF" 50.392,37.912 r180 top
C195 "100nF" "CAP 0201/0603 RF" 48.579,26.258 r180 top
C196 "100nF" "CAP 0201/0603 RF" 48.579,26.908 r180 top
C197 "100nF" "CAP 0201/0603 RF" 49.198,28.33 r90 top
C198 "10uF" "CAP 0402/1005 RF" 48.436,28.124 r90 top
C199 "100nF" "CAP 0201/0603 RF" 41.076,38.725 r0 top
C200 "100nF" "CAP 0201/0603 RF" 41.076,38.039 r0 top
C201 "100nF" "CAP 0201/0603 RF" 39.216,34.553 r90 top
C202 "10uF" "CAP 0402/1005 RF" 39.952,34.746 r90 top
C203 "100nF" "CAP 0201/0603 RF" 51.518,35.194 r270 top
C204 "100nF" "CAP 0201/0603 RF" 52.193,35.194 r270 top
C205 "100nF" "CAP 0201/0603 RF" 50.181,35.669 r180 top
C206 "10uF" "CAP 0402/1005 RF" 50.368,34.936 r180 top
C207 "100nF" "CAP 0201/0603 RF" 47.979,43.989 r270 top
C208 "100nF" "CAP 0201/0603 RF" 48.639,43.989 r270 top
C209 "100nF" "CAP 0201/0603 RF" 81.71,38.516 r270 bottom
C210 "10uF" "CAP 0402/1005 RF" 80.923,38.319 r270 bottom
C211 "100nF" "CAP 0201/0603 RF" 36.854,38.49 r90 top
C212 "100nF" "CAP 0201/0603 RF" 37.489,38.496 r90 top
C213 "100nF" "CAP 0201/0603 RF" 39.851,38.998 r270 top
C214 "10uF" "CAP 0402/1005 RF" 38.657,38.725 r0 top
C215 "100nF" "CAP 0201/0603 RF" 43.475,42.663 r0 top
C216 "100nF" "CAP 0201/0603 RF" 43.475,43.311 r0 top
C217 "100nF" "CAP 0201/0603 RF" 45.521,40.325 r180 top
C218 "10uF" "CAP 0402/1005 RF" 43.65,41.553 r270 top
C219 "4.7uF" "CAP 0603/1608 RF" 32.332,43.322 r270 top
C220 "4.7uF" "CAP 0603/1608 RF" 50.961,32.121 r0 top
C221 "1nF" "CAP 0402/1005 RF" 37.692,42.23 r90 top
C222 "4.7uF" "CAP 0603/1608 RF" 54.833,37.889 r0 top
C223 "100nF" "CAP 0201/0603 RF" 21.264,67.986 r0 bottom
C224 "100nF" "CAP 0201/0603 RF" 21.264,68.799 r0 bottom
C225 "100nF" "CAP 0201/0603 RF" 44.454,45.761 r180 bottom
C226 "100nF" "CAP 0201/0603 RF" 44.454,45.1 r180 bottom
C227 "100nF" "CAP 0201/0603 RF" 17.53,59.299 r180 bottom
C228 "100nF" "CAP 0201/0603 RF" 17.53,60.01 r180 bottom
C229 "100nF" "CAP 0201/0603 RF" 51.84,61.527 r270 bottom
C230 "10pF" "CAP 0402/1005 RF" 10.919,18.534 r270 top
C231 "10pF" "CAP 0402/1005 RF" 11.637,23.684 r0 top
C232 "1nF" "CAP 0402/1005 RF" 26.846,33.899 r180 bottom
C233 "100nF" "CAP 0201/0603 RF" 54.888,8.982 r270 bottom
C234 "100nF" "CAP 0201/0603 RF" 54.075,8.982 r270 bottom
C235 "100nF" "CAP 0201/0603 RF" 49.884,8.982 r270 bottom
C236 "100nF" "CAP 0201/0603 RF" 49.071,8.982 r270 bottom
C237 "470nF" "CAP 0402/1005 RF" 68.832,22.139 r90 top
C238 "470nF" "CAP 0402/1005 RF" 73.684,23.079 r270 top
C239 "100nF" "CAP 0201/0603 RF" 79.932,30.546 r270 top
C240 "100nF" "CAP 0201/0603 RF" 81.964,35.118 r90 top
C241 "100nF" "CAP 0201/0603 RF" 24.357,89.754 r270 top
C242 "100nF" "CAP 0201/0603 RF" 26.059,87.595 r180 top
C243 "100nF" "CAP 0201/0603 RF" 65.2,39.614 r270 top
C244 "100nF" "CAP 0201/0603 RF" 74.039,39.919 r0 top
C245 "47pF" "CAP 0201/0603 RF" 124.256,8.9 r90 top
C246 "47pF" "CAP 0201/0603 RF" 116.881,8.9 r90 top
C247 "4.7uF" "CAP 0603/1608 RF" 109.855,8.225 r90 top
C248 "4.7uF" "CAP 0603/1608 RF" 102.48,8.225 r90 top
C249 "100nF" "CAP 0201/0603 RF" 116.381,2.25 r90 top
C250 "100nF" "CAP 0201/0603 RF" 109.03,2.25 r90 top
C251 "100nF" "CAP 0201/0603 RF" 102.155,2.25 r90 top
C? "1uF" "CAP 0402/1005 RF" 107.055,2.15 r0 top
C? "1uF" "CAP 0402/1005 RF" 102.73,2.15 r0 top
C? "4.7uF" "CAP 0603/1608 RF" 107.405,12.701 r0 top
D1 "MADL-011021-14150T" MADP-011029-14150 42.307,128.068 r270 bottom
D2 "MADP-011029-14150T" MADP-011029-14150 42.707,131.481 r270 bottom
D3 "MBRM140T3" "CASE 457" 12.507,26.161 r270 top
D4 "MBRM140T3" "CASE 457" 21.626,40.399 r270 top
D5 "MBRM140T3" "CASE 457" 17.054,40.225 r90 top
D6 "MBRM140T3" "CASE 457" 17.054,25.617 r270 top
D7 "LTST-C190GKT" "LED 0603/1608 GREEN" 24.281,14.443 r270 top
D8 "LTST-C190GKT" "LED 0603/1608 GREEN" 70.852,19.04 r0 top
D9 "LTST-C190GKT" "LED 0603/1608 GREEN" 22.655,14.443 r270 top
FB1 "120R" "FER 0402/1005" 52.868,101.183 r180 top
FB2 "120R" "FER 0402/1005" 34.468,117.127 r0 bottom
FB3 "120R" "FER 0402/1005" 37.366,114.54 r270 bottom
FB4 "120R" "FER 0603/1608" 42.061,71.57 r270 top
FB5 "10R" "FER 0402/1005" 59.925,58.588 r0 bottom
FB6 "10R" "FER 0402/1005" 67.529,54.346 r0 top
FB7 "10R" "FER 0402/1005" 77.222,65.558 r0 top
FB8 "10R" "FER 0402/1005" 77.222,64.122 r0 top
FB9 "10R" "FER 0402/1005" 59.942,59.604 r0 bottom
FB10 "120R" "FER 0603/1608" 30.005,69.558 r270 top
FB11 "120R" "FER 0603/1608" 36.93,61.61 r90 top
FB12 "120R" "FER 0603/1608" 61.644,56.759 r180 top
FB13 "120R" "FER 0603/1608" 41.034,56.276 r0 top
FB14 "120R" "FER 0603/1608" 58.571,63.668 r270 top
FB15 "220R" "FER 0603/1608" 41.106,27.572 r90 top
FB16 "220R" "FER 0603/1608" 48.248,42.009 r270 top
FB17 "220R" "FER 0603/1608" 41.032,42.028 r270 top
FB18 "220R" "FER 0603/1608" 51.471,41.668 r270 top
FB19 "220R" "FER 0603/1608" 44.172,27.572 r90 top
FB20 "220R" "FER 0603/1608" 37.071,33.416 r0 bottom
FB21 "120R" "FER 0603/1608" 54.833,36.409 r0 top
FB22 "220R" "FER 0603/1608" 50.864,36.718 r180 top
FB23 "220R" "FER 0603/1608" 47.225,27.572 r90 top
FB24 "220R" "FER 0603/1608" 40.348,37.176 r180 top
FB25 "220R" "FER 0603/1608" 50.843,33.778 r180 top
FB26 "220R" "FER 0603/1608" 50.58,44.161 r0 top
FB27 "220R" "FER 0603/1608" 38.149,39.893 r0 top
FB28 "220R" "FER 0603/1608" 44.825,42.028 r270 top
FB29 "120R" "FER 0603/1608" 79.576,48.072 r90 bottom
FB30 "120R" "FER 0603/1608" 37.449,44.059 r0 top
FB31 "10R" "FER 0402/1005" 40.986,19.334 r0 top
FB32 "10R" "FER 0402/1005" 52.297,15.941 r180 top
FB33 "10R" "FER 0402/1005" 74.293,48.064 r90 top
FB34 "10R" "FER 0402/1005" 40.956,20.424 r0 top
FB35 "120R" "FER 0603/1608" 59.333,61.077 r180 top
FB36 "120R" "FER 0603/1608" 54.684,48.58 r180 top
FID1 "Fiducials" FIDUCIALS 72.464,57.673 r90 top
FID2 "Fiducials" FIDUCIALS 28.306,111.292 r90 top
FID3 "Fiducials" FIDUCIALS 36.505,27.434 r90 top
FID4 "Fiducials" FIDUCIALS 30.046,10.302 r90 top
FID5 "Fiducials" FIDUCIALS 17.444,97.805 r90 top
FID6 "Fiducials" FIDUCIALS 43.254,76.596 r90 top
FL1 "TA1703A (1570)" TAI-SAW_3X3P6 42.307,119.541 r270 bottom
FL2 "TA1703A (1570)" TAI-SAW_3X3P6 41.908,98.385 r270 bottom
J1 "1909763-1" TECO-1909763-1_V 43.385,134.972 r90 top
J2 "1909763-1" TECO-1909763-1_V 49.133,137.772 r0 top
J3 "1909763-1" TECO-1909763-1_V 55.885,124.297 r270 top
J4 "1909763-1" TECO-1909763-1_V 55.885,129.504 r270 top
J7 "1909763-1" TECO-1909763-1_V 47.19,107.457 r90 bottom
J9 "1909763-1" TECO-1909763-1_V 47.558,93.432 r90 bottom
J10 "1909763-1" TECO-1909763-1_V 35.031,88.352 r270 bottom
J13 "1909763-1" TECO-1909763-1_V 10.106,66.259 r270 bottom
J14 "1909763-1" TECO-1909763-1_V 10.106,70.526 r270 bottom
J15 "1909763-1" TECO-1909763-1_V 10.106,57.521 r270 bottom
J16 "1909763-1" TECO-1909763-1_V 10.106,61.788 r270 bottom
L1 "8.2nH" "IND 0402/1005 RF WW" 42.3,104.846 r90 bottom
L2 "8.2nH" "IND 0402/1005 RF WW" 40.248,89.666 r0 bottom
L3 "CDRH5D28NP-5R3NC" CDRH5D28 12.769,33.21 r90 top
L4 "6.8uH" FB0603 25.492,39.105 r270 top
L5 "CDRH5D28-8R2" CDRH5D28 20.03,47.067 r0 top
L6 "CDRH5D28-8R2" CDRH5D28 11.593,40.477 r90 top
L7 "CDRH5D28NP-100NC" CDRH5D28 22.104,27.6 r0 top
L8 "1uH" RC1206 43.078,63.626 r0 top
L9 "VLF3012ST-2R2M1R4" VLF3012ST-2R2M1R4 18.044,16.22 r90 top
P1 "Connector M.2 - RF" "Connector M.2 Key M" 120.625,0.05 r0 top
R1 "10R" "RES 0201/0603" 38.859,75.195 r270 bottom
R2 "0mR" "RES 0402/1005 RF" 38.809,73.443 r270 bottom
R3 "10R" "RES 0201/0603" 38.783,71.721 r270 bottom
R4 "0mR" "RES 0402/1005 RF" 38.783,69.437 r270 bottom
R5 "49.9R" "RES 0201/0603" 37.97,73.595 r90 bottom
R6 "10R" "RES 0201/0603" 37.361,71.685 r90 bottom
R7 "49.9R" "RES 0201/0603" 39.271,77.685 r180 bottom
R8 "10R" "RES 0201/0603" 41.171,71.69 r270 bottom
R9 "49.9R" "RES 0201/0603" 40.587,73.595 r270 bottom
R10 "10R" "RES 0201/0603" 39.698,75.195 r270 bottom
R11 "0mR" "RES 0402/1005 RF" 39.748,73.45 r270 bottom
R12 "10R" "RES 0201/0603" 39.748,71.716 r270 bottom
R13 "0mR" "RES 0402/1005 RF" 39.748,69.43 r270 bottom
R14 "100R" "RES 0201/0603" 43.762,53.609 r90 bottom
R15 "FCSL110R005FER" FCSL110R005FERCT-ND 31.13,19.262 r180 top
R16 "200kR" "RES 0402/1005 RF" 77.316,20.996 r270 top
R17 "1kR" "RES 0402/1005 RF" 81.507,18.43 r270 top
R18 "1kR" "RES 0402/1005 RF" 80.592,20.996 r90 top
R19 "1kR" "RES 0402/1005 RF" 84.682,24.272 r270 top
R20 "0mR" "RES 0402/1005 RF" 65.733,27.397 r90 top
R21 "10kR" "RES 0402/1005 RF" 55.7,24.806 r90 top
R22 "0mR" "RES 0402/1005 RF" 40.689,11.87 r90 bottom
R23 "10kR" "RES 0402/1005 RF" 43.102,13.064 r270 top
R24 "10kR" "RES 0402/1005 RF" 41.121,14.341 r90 top
R25 "0mR" "RES 0402/1005 RF" 72.414,31.181 r90 top
R26 "0mR" "RES 0402/1005 RF" 76.274,27.288 r270 top
R27 "10kR" "RES 0402/1005 RF" 66.673,27.397 r270 top
R28 "10kR" "RES 0402/1005 RF" 78.764,18.43 r270 top
R29 "10kR" "RES 0402/1005 RF" 79.678,18.43 r270 top
R30 "4.7kR" "RES 0402/1005 RF" 29.386,95.037 r0 top
R31 "10kR" "RES 0402/1005 RF" 78.764,20.996 r90 top
R32 "0mR" "RES 0402/1005 RF" 82.447,20.996 r90 top
R33 "14.7kR" "RES 0402/1005 RF" 29.386,95.951 r180 top
R36 "0mR" "RES 0402/1005 RF" 36.752,11.877 r90 bottom
R39 "0mR" "RES 0402/1005 RF" 41.85,135.215 r0 bottom
R40 "0mR" "RES 0402/1005 RF" 42.75,124.547 r180 bottom
R41 "51R" "RES 0402/1005 RF" 27.236,35.494 r90 top
R42 "0mR" "RES 0402/1005 RF" 42.086,14.341 r90 top
R43 "0mR" "RES 0402/1005 RF" 42.75,107.457 r180 bottom
R44 "0mR" "RES 0402/1005 RF" 42.35,93.432 r180 bottom
R45 "0mR" "RES 0402/1005 RF" 36.904,14.403 r90 top
R46 "15R" "RES 0603/1608" 36.556,101.205 r90 bottom
R47 "0mR" "RES 0402/1005 RF" 35.965,14.396 r90 top
R48 "0mR" "RES 0402/1005 RF" 37.692,11.877 r90 bottom
R49 "0mR" "RES 0402/1005 RF" 39.358,88.352 r0 bottom
R50 "100kR" "RES 0402/1005 RF" 34.88,49.774 r180 top
R51 "24.9kR" "RES 0402/1005 RF" 34.872,50.892 r0 top
R52 "21.5kR" "RES 0402/1005 RF" 24.03,52.151 r180 top
R53 "10kR" "RES 0402/1005 RF" 24.027,53.279 r0 top
R56 "31.2kR" "RES 0402/1005 RF" 14.238,46.982 r270 top
R57 "18.2kR" "RES 0402/1005 RF" 26.853,33.924 r180 top
R58 "10kR" "RES 0402/1005 RF" 14.679,48.733 r0 top
R59 "61.9kR" "RES 0402/1005 RF" 26.509,27.32 r90 top
R60 "10.5kR" "RES 0402/1005 RF" 26.915,28.768 r0 top
R61 "4.02kR" "RES 0402/1005 RF" 22.244,93.541 r270 top
R62 "1kR" "RES 0402/1005 RF" 22.683,95.274 r180 top
R63 "1.8kR" "RES 0402/1005 RF" 16.78,82.234 r0 top
R64 "1kR" "RES 0402/1005 RF" 14.931,81.169 r0 top
R65 "100kR" "RES 0402/1005 RF" 40.694,71.12 r90 top
R66 "24.9kR" "RES 0402/1005 RF" 40.119,68.58 r180 top
R67 "1.5kR" "RES 0402/1005 RF" 28.24,70.316 r0 top
R68 "1kR" "RES 0402/1005" 25.987,71.093 r270 top
R69 "1.5kR" "RES 0402/1005 RF" 61.72,61.179 r270 top
R70 "1kR" "RES 0402/1005 RF" 64.133,63.356 r270 top
R71 "4.99kR" "RES 0402/1005 RF" 33.457,58.918 r180 top
R72 "3.32kR" "RES 0402/1005 RF" 35.323,58.994 r180 top
R73 "4.99kR" "RES 0402/1005 RF" 57.034,67.221 r0 top
R74 "3.32kR" "RES 0402/1005 RF" 54.441,64.118 r90 top
R75 "56kR" "RES 0402/1005 RF" 36.505,65.624 r270 top
R76 "10kR" "RES 0402/1005 RF" 37.438,65.524 r90 top
R77 "0mR" "RES 0402/1005 RF" 49.096,39.088 r270 bottom
R78 "0mR" "RES 0402/1005 RF" 50.816,30.343 r180 top
R79 "51R" "RES 0402/1005 RF" 54.531,39.901 r180 bottom
R80 "75kR" "RES 0402/1005 RF" 10.825,16.55 r270 top
R81 "10.7kR" "RES 0402/1005 RF" 9.884,18.407 r270 top
R82 "75kR" "RES 0402/1005 RF" 12.083,22.331 r270 top
R83 "10kR" "RES 0402/1005 RF" 20.832,16.322 r180 top
R84 "51R" "RES 0402/1005 RF" 54.531,42.771 r0 bottom
R85 "10.7kR" "RES 0402/1005 RF" 11.137,22.33 r90 top
R86 "100kR" "RES 0402/1005 RF" 34.822,43.272 r180 top
R87 "100R" "RES 0402/1005 RF" 19.346,68.39 r90 bottom
R88 "38.3kR" "RES 0402/1005 RF" 35.787,42.332 r180 top
R89 "0mR" "RES 0402/1005 RF" 54.608,45.779 r90 bottom
R90 "0mR" "RES 0402/1005 RF" 55.428,40.859 r180 bottom
R91 "0mR" "RES 0402/1005 RF" 55.428,41.82 r180 bottom
R92 "0mR" "RES 0402/1005 RF" 17.568,67.935 r0 bottom
R93 "0mR" "RES 0402/1005 RF" 17.568,68.84 r0 bottom
R94 "0mR" "RES 0402/1005 RF" 47.997,45.888 r180 bottom
R95 "100R" "RES 0402/1005 RF" 45.972,45.431 r270 bottom
R96 "0mR" "RES 0402/1005 RF" 47.997,44.973 r180 bottom
R97 "0mR" "RES 0402/1005 RF" 20.159,59.147 r180 bottom
R98 "0mR" "RES 0402/1005 RF" 20.159,60.163 r180 bottom
R99 "0mR" "RES 0402/1005 RF" 42.758,129.754 r180 bottom
R100 "1kR" "RES 0402/1005 RF" 24.255,16.906 r90 top
R101 "0mR" "RES 0402/1005 RF" 83.767,35.474 r90 top
R102 "100kR" "RES 0402/1005 RF" 37.336,45.354 r180 top
R103 "100kR" "RES 0402/1005 RF" 69.957,58.613 r0 top
R104 "0mR" "RES 0402/1005 RF" 38.733,11.877 r90 bottom
R105 "0mR" "RES 0402/1005 RF" 39.724,11.877 r90 bottom
R106 "100kR" "RES 0402/1005 RF" 33.856,68.57 r180 top
R107 "100kR" "RES 0402/1005 RF" 69.975,60.569 r180 top
R108 "100kR" "RES 0402/1005 RF" 69.957,59.604 r180 top
R109 "100kR" "RES 0402/1005 RF" 30.808,39.157 r90 top
R110 "100kR" "RES 0402/1005 RF" 10.184,21.478 r90 top
R111 "0mR" "RES 0402/1005 RF" 33.66,32.375 r180 top
R112 "0mR" "RES 0402/1005 RF" 33.66,30.546 r180 top
R113 "1kR" "RES 0402/1005 RF" 83.379,54.092 r0 top
R114 "1kR" "RES 0402/1005 RF" 83.379,55.921 r0 top
R115 "1kR" "RES 0402/1005 RF" 83.379,52.263 r0 top
R116 "0mR" "RES 0402/1005 RF" 83.379,55.006 r180 top
R117 "0mR" "RES 0402/1005 RF" 83.379,51.349 r180 top
R118 "0mR" "RES 0402/1005 RF" 83.379,53.178 r180 top
R119 "0mR" "RES 0402/1005 RF" 55.7,22.494 r90 top
R120 "0mR" "RES 0402/1005 RF" 40.562,90.871 r180 top
R121 "0mR" "RES 0402/1005 RF" 40.562,92.751 r180 top
R122 "0mR" "RES 0402/1005 RF" 40.562,94.58 r180 top
R123 "1kR" "RES 0402/1005 RF" 40.562,89.931 r0 top
R124 "1kR" "RES 0402/1005 RF" 40.562,93.665 r0 top
R125 "1kR" "RES 0402/1005 RF" 40.562,91.811 r0 top
R126 "1kR" "RES 0402/1005 RF" 83.717,24.272 r270 top
R127 "1kR" "RES 0402/1005 RF" 81.507,20.996 r270 top
R128 "1kR" "RES 0402/1005 RF" 82.447,18.43 r90 top
R129 "0mR" "RES 0402/1005 RF" 33.66,33.289 r0 top
R130 "0mR" "RES 0402/1005 RF" 33.66,31.461 r0 top
R131 "0mR" "RES 0402/1005 RF" 82.828,35.456 r270 top
R132 "120R" "RES 0402/1005 RF" 70.102,20.843 r90 top
R133 "300R" "RES 0402/1005 RF" 20.852,15.23 r180 top
R134 "0mR" "RES 0402/1005 RF" 28.827,87.569 r90 top
R135 "0mR" "RES 0402/1005 RF" 27.837,87.569 r270 top
R136 "100kR" "RES 0402/1005 RF" 70.813,52.72 r90 top
R137 "100kR" "RES 0402/1005 RF" 70.813,50.848 r90 top
R138 "1kR" "RES 0402/1005 RF" 66.318,17.11 r0 top
R139 "1kR" "RES 0402/1005 RF" 66.318,18.964 r0 top
R140 "1kR" "RES 0402/1005 RF" 66.318,21.707 r0 top
R141 "0mR" "RES 0402/1005 RF" 66.318,20.793 r180 top
R142 "0mR" "RES 0402/1005 RF" 66.31,19.878 r180 top
R143 "0mR" "RES 0402/1005 RF" 66.318,18.049 r180 top
R145 "1kR" "RES 0402/1005 RF" 71.728,34.915 r180 top
R? "40.2kR" "RES 0402/1005 RF" 107.205,7.35 r0 top
R? "11.1kR" "RES 0402/1005 RF" 102.88,7.35 r0 top
R? "6.8MR" "RES 0402/1005 RF" 56.975,5.55 r0 top
T1 "MABA-007681-CT2010" MABA-007681-CT2010 39.183,82.092 r180 bottom
T2 "MABAES0060" MABAES0060 30.356,35.553 r180 top
TP1 "TP" "Test Point" 86.175,13.737 r0 top
TP2 "TP" "Test Point" 84.27,13.838 r90 top
TP3 "TP" "Test Point" 79.32,13.737 r90 top
TP4 "TP" "Test Point" 81.861,13.61 r90 top
TP5 "TP" "Test Point" 90.304,15.58 r90 top
TP6 "TP" "Test Point" 88.45,15.275 r90 top
U1 "AD9690" AD9690 49.387,55.122 r270 bottom locked
U2 "HMC472ALP4E" HMC472ALP4E 42.05,113.155 r270 bottom
U3 "INA226AIDGSR" INA226 30.77,29.428 r270 top
U4 "MCP23017T-E/ML" MCP23017/MCP23S17 77.57,52.974 r90 top
U5 "MCP23017T-E/ML" MCP23017/MCP23S17 34.509,91.658 r90 top
U6 "AT24CM02-SSHM-T" AT24CM02 60.377,24.919 r0 top
U7 "PCA9306DQER" PCA9306 80.486,25.85 r180 top
U8 "LP5900SD-1.8/NOPB" LP5900 71.245,23.129 r180 top
U9 "LMK04610RTQR" LMK04610 44.111,34.552 r90 bottom
U10 "SN74LV4T125RGYR" SN74LV4T125RGYR 76.3,31.46 r0 top
U11 "SN74AXC4T774PWR" SN74AXC4T774PWR 69.493,38.319 r0 top
U12 "SC18IS602BIPW/S8HP" SC18IS602B 61.111,17.592 r0 top
U13 "BGA524N6" TSNP-6-10-FP 42.3,102.859 r90 bottom
U14 "BGA616" GPS05605 40.85,91.527 r180 bottom
U15 "AP2210K-3.3TRG1" AP2210K-3.3TRG1 70.148,26.484 r180 top
U16 "ADP1741ACPZ-R7" ADP1752_1753/ADP1740_1741 33.832,47.051 r90 top
U17 "LT3504EUFD#PBF" LT3504 23.434,34.586 r0 top
U18 "MCP1727T-ADJE/MF" MCP1727T-ADJE/MF 13.425,17.559 r180 top
U19 "LP3878SD-ADJ/NOPB" LP3878-ADJ 18.776,94.391 r0 top
U20 "MCP1727T-ADJE/MF" MCP1727T-ADJE/MF 14.699,22.467 r180 top
U21 "LP3878SD-ADJ/NOPB" LP3878-ADJ 16.026,76.419 r90 top
U22 "ADP1741ACPZ-R7" ADP1752_1753/ADP1740_1741 37.864,71.404 r0 top
U23 "ADP1741ACPZ-R7" ADP1752_1753/ADP1740_1741 29.116,73.121 r270 top
U24 "ADP1741ACPZ-R7" ADP1752_1753/ADP1740_1741 65.276,59.909 r180 top
U25 "ADP125ACPZ-R7" ADP124_125 34.999,61.204 r90 top
U26 "LP5900SD-1.8/NOPB" LP5900 49.644,65.899 r180 top
U27 "ADP125ACPZ-R7" ADP124_125 56.462,63.795 r270 top
U28 "ADP125ACPZ-R7" ADP124_125 33.333,65.695 r180 top
U29 "TPS7A3501DRVT" TPS7A3501 42.086,46.497 r270 top
U30 "TPS62163DSGR" TPS62163 21.589,19.256 r180 top
U31 "ADP1753ACPZ-R7" ADP1752_1753/ADP1740_1741 33.882,39.766 r90 top
U32 "TXB0304RSVR" TXB0304 81.507,32.68 r0 top
U33 "TXB0304RSVR" TXB0304 26.509,90.008 r270 top
X1 "VG-4513CA122.8800M-GFCT3" VG-4513CA 79.635,42.976 r180 bottom

## Footprints (in the part's own frame and the unit in brackets; to place one, negate y for a bottom-side part, rotate by r counter-clockwise, add the part's x,y. Pads: shape width x height; smd on the part's side, far side on the other; paste and mask are expansions set on the pad)
AD9690 [mm] "AD9690 9 x 9mm, 64 pin, 0.5 pitch 7.6sq Pad"
  oval 0.6x0.3 smd: 1(-4.4,3.75) 2(-4.4,3.25) 3(-4.4,2.75) 4(-4.4,2.25) 5(-4.4,1.75) 6(-4.4,1.25) 7(-4.4,0.75) 8(-4.4,0.25) 9(-4.4,-0.25) 10(-4.4,-0.75) 11(-4.4,-1.25) 12(-4.4,-1.75) 13(-4.4,-2.25) 14(-4.4,-2.75) 15(-4.4,-3.25) 16(-4.4,-3.75) 33(4.4,-3.75) 34(4.4,-3.25) 35(4.4,-2.75) 36(4.4,-2.25) 37(4.4,-1.75) 38(4.4,-1.25) 39(4.4,-0.75) 40(4.4,-0.25) 41(4.4,0.25) 42(4.4,0.75) 43(4.4,1.25) 44(4.4,1.75) 45(4.4,2.25) 46(4.4,2.75) 47(4.4,3.25) 48(4.4,3.75)
  oval 0.3x0.6 smd: 17(-3.75,-4.4) 18(-3.25,-4.4) 19(-2.75,-4.4) 20(-2.25,-4.4) 21(-1.75,-4.4) 22(-1.25,-4.4) 23(-0.75,-4.4) 24(-0.25,-4.4) 25(0.25,-4.4) 26(0.75,-4.4) 27(1.25,-4.4) 28(1.75,-4.4) 29(2.25,-4.4) 30(2.75,-4.4) 31(3.25,-4.4) 32(3.75,-4.4) 49(3.75,4.4) 50(3.25,4.4) 51(2.75,4.4) 52(2.25,4.4) 53(1.75,4.4) 54(1.25,4.4) 55(0.75,4.4) 56(0.25,4.4) 57(-0.25,4.4) 58(-0.75,4.4) 59(-1.25,4.4) 60(-1.75,4.4) 61(-2.25,4.4) 62(-2.75,4.4) 63(-3.25,4.4) 64(-3.75,4.4)
  rect 7.6x7.6 smd paste-5: 65(0,0)
  rect 1.5x1.5 on Bottom Paste: ""(-2.625,-2.625) ""(-2.625,-0.875) ""(-2.625,0.875) ""(-2.625,2.625) ""(-0.875,-2.625) ""(-0.875,-0.875) ""(-0.875,0.875) ""(-0.875,2.625) ""(0.875,-2.625) ""(0.875,-0.875) ""(0.875,0.875) ""(0.875,2.625) ""(2.625,-2.625) ""(2.625,-0.875) ""(2.625,0.875) ""(2.625,2.625)
  silkscreen extent -5.47,-4.7 4.7,4.7, body extent -4.57,-4.57 4.57,4.57, height 0.8
ADP124_125 [mm] "8-Lead Lead Frame Chip Scale Package [LFCSP_UD]  2 mm × 2 mm Body, Ultra Thin, Dual Lead  (CP-8-10)"
  rect 0.35x0.25 smd: 1(-0.9,0.75) 2(-0.9,0.25) 3(-0.9,-0.25) 4(-0.9,-0.75) 5(0.9,-0.75) 6(0.9,-0.25) 7(0.9,0.25) 8(0.9,0.75)
  rect 1x1.6 smd: 9(0,0)
  silkscreen extent -1.5,-1.2 1.05,1.25, body extent -1.15,-1.05 1.15,1.05, height 0.55
ADP1752_1753/ADP1740_1741 [mm] "16-Lead Lead Frame Chip Scale Package [LFCSP_WQ]  4 mm × 4 mm Body, Very Very Thin Quad  (CP-16-23)"
  rect 0.6x0.3 smd: 1(-1.675,0.975) 2(-1.675,0.325) 3(-1.675,-0.325) 4(-1.675,-0.975) 9(1.675,-0.975) 10(1.675,-0.325) 11(1.675,0.325) 12(1.675,0.975)
  rect 0.3x0.6 smd: 5(-0.975,-1.675) 6(-0.325,-1.675) 7(0.325,-1.675) 8(0.975,-1.675) 13(0.975,1.675) 14(0.325,1.675) 15(-0.325,1.675) 16(-0.975,1.675)
  rect 2.1x2.1 smd: 17(0,0)
  silkscreen extent -2.82,-2.05 2.05,2.05, body extent -2.05,-2.05 2.05,2.05, height 0.8
AP2210K-3.3TRG1 [mm] "SOT23, 5-Leads, Body 2.96x2.83mm, Pitch 0.95mm, IPC High Density"
  rect 1x0.7 smd: 1(-1.3,0.95) 2(-1.3,0) 3(-1.3,-0.95) 4(1.3,-0.95) 5(1.3,0.95)
  silkscreen extent -1.43,-1.55 0.45,1.97, body extent -1.5,-1.55 1.5,1.55, height 1.45
AT24CM02 [mm]
  rect 1.55x0.6 smd: 1(-2.7,1.905) 2(-2.7,0.635) 3(-2.7,-0.635) 4(-2.7,-1.905) 5(2.7,-1.905) 6(2.7,-0.635) 7(2.7,0.635) 8(2.7,1.905)
  silkscreen extent -2.82,-2.2 1.92,2.88, body extent -3,-2.45 3,2.45, height 1.75
"CAP 0201/0603 RF" [mm] "Chip Capacitor, 2-Leads, Body 0.60x0.30mm, IPC High Density"
  rect 0.3x0.32 smd: 1(-0.26,0) 2(0.26,0)
  silkscreen extent -0.58,-0.33 0.58,0.33, body extent -0.3,-0.15 0.3,0.15, height 0.3
"CAP 0402/1005 RF" [mm] "Chip Capacitor, 2-Leads, Body 1.02x0.51mm, IPC High Density"
  rect 0.55x0.54 smd: 1(-0.39,0) 2(0.39,0)
  silkscreen extent -0.87,-0.45 0.87,0.45, body extent -0.5,-0.26 0.5,0.26, height 0.52
"CAP 0603/1608 RF" [mm] "Chip Capacitor, 2-Leads, Body 1.60x0.80mm, IPC High Density"
  rect 0.8x0.9 smd: 1(-0.625,0) 2(0.625,0)
  silkscreen extent -1.2,-0.63 1.2,0.63, body extent -0.8,-0.41 0.8,0.41, height 0.82
"CAP 0805/2012 RF" [mm] "Chip Capacitor, 2-Leads, Body 2.00x1.20mm, IPC High Density"
  rect 1.1x1.3 smd: 1(-0.7,0) 2(0.7,0)
  silkscreen extent -1.43,-0.82 1.43,0.82, body extent -1,-0.64 1,0.64, height 1.26
"CASE 457" [mil] "CASE 457-04, MBRM140T1G"
  rect 105.12x100 smd: 1(-65.06,0)
  rect 30x50 smd: 2(27.5,0)
  silkscreen extent -126,-61 -122,-57, body extent -118,-52 27,53, height 43
CDRH5D28 [mm] "CDRH5D28 , Precision Wire Wound Inductor, 2-Leads, Body 6,00x6,00mm, IPC High Density"
  rect 2.15x6.3 smd: 1(-2.075,0) 2(2.075,0)
  silkscreen extent -0.45,-3 0.45,3, body extent -3.1,-3.15 3.1,3.15, height 3.1
"Connector M.2 Key M" [mm] "Key M"
  rect 0.35x1.7 smd: 1(9.25,1.4) 3(8.75,1.4) 5(8.25,1.4) 7(7.75,1.4) 9(7.25,1.4) 11(6.75,1.4) 13(6.25,1.4) 15(5.75,1.4) 17(5.25,1.4) 19(4.75,1.4) 21(4.25,1.4) 23(3.75,1.4) 25(3.25,1.4) 27(2.75,1.4) 29(2.25,1.4) 31(1.75,1.4) 33(1.25,1.4) 35(0.75,1.4) 37(0.25,1.4) 39(-0.25,1.4) 41(-0.75,1.4) 43(-1.25,1.4) 45(-1.75,1.4) 47(-2.25,1.4) 49(-2.75,1.4) 51(-3.25,1.4) 53(-3.75,1.4) 55(-4.25,1.4) 57(-4.75,1.4) 59(-7.25,1.4) 61(-7.75,1.4) 63(-8.25,1.4) 65(-8.75,1.4) 67(-9.25,1.4)
  rect 0.35x2.2 smd far side: 2(9,1.65) 4(8.5,1.65) 6(8,1.65) 8(7.5,1.65) 10(7,1.65) 12(6.5,1.65) 14(6,1.65) 16(5.5,1.65) 18(5,1.65) 20(4.5,1.65) 22(4,1.65) 24(3.5,1.65) 26(3,1.65) 28(2.5,1.65) 30(2,1.65) 32(1.5,1.65) 34(1,1.65) 36(0.5,1.65) 38(0,1.65) 40(-0.5,1.65) 42(-1,1.65) 44(-1.5,1.65) 46(-2,1.65) 48(-2.5,1.65) 50(-3,1.65) 52(-3.5,1.65) 54(-4,1.65) 56(-4.5,1.65) 58(-5,1.65) 60(-7.5,1.65) 62(-8,1.65) 64(-8.5,1.65) 66(-9,1.65)
  oval 5x7 hole 4 slot 2 at 0 deg unplated: CPAD(-25,8.5) CPAD(0,74) CPAD(25,8.5)
  Top Layer pour cut-out: -6.925,-0.004
  Top Layer lines w0.02: -9.925,3.7 -9.925,3.975
  Keep-Out Layer board cut-out: -6.725,0 -6.725,2.902 -6.679,3.132 -6.549,3.326 -6.355,3.456 -6.125,3.502 -6.125,3.502 -5.895,3.456 -5.701,3.326 -5.571,3.132 -5.525,2.902 -5.525,2.902 -5.525,0 9.925,0 9.925,3.975 9.935,4.023 9.962,4.063 10.002,4.09 10.05,4.1 10.05,4.1 37.125,4.1 37.125,0 -9.925,0 -9.925,3.975 -9.942,4.037 -9.988,4.083 -10.05,4.1 -10.05,4.1 -39.45,4.1 -39.45,0
  Keep-Out Layer board cut-out: -13.6,2.7
  Keep-Out Layer board cut-out: -5.008,1.375
  Keep-Out Layer board cut-out: -6.925,-0.004
  Keep-Out Layer region: -9.925,0 9.925,0 9.925,4 -9.925,4
  silkscreen extent -9.92,0 9.92,4.25
FB0603 [mm] "Chip Inductor, 2-Leads, Body 1,60x0,80mm, IPC High Density"
  rect 0.6x0.85 smd: 1(-0.7,0) 2(0.7,0)
  silkscreen extent -0.05,-0.3 0.05,0.3, body extent -0.8,-0.4 0.8,0.4, height 0.8
FCSL110R005FERCT-ND [mm] "Wide 4320 (11050 Metric), 2043"
  rect 1.05x11.2 smd: 1(-2.3,0) 2(2.3,0)
  silkscreen extent -1.4,-5.5 1.4,5.5, body extent -2.8,-5.6 2.8,5.6, height 0.8
"FER 0402/1005" [mm] "Chip Ferrite, 2-Leads, Body 1.02x0.51mm, IPC Medium Density"
  rect 0.6x0.64 smd: 1(-0.44,0) 2(0.44,0)
  silkscreen extent -1,-0.5 1,0.5, body extent -0.5,-0.26 0.5,0.26, height 0.52
"FER 0603/1608" [mm] "Chip Ferrite, 2-Leads, Body 1.60x0.80mm, IPC Medium Density"
  rect 0.9x1 smd: 1(-0.675,0) 2(0.675,0)
  silkscreen extent -1.4,-0.7 1.4,0.7, body extent -0.8,-0.41 0.8,0.41, height 0.82
FIDUCIALS [mm]
  round 1 smd paste-10 mask+0.5: 0(0,0)
  round 1 smd far side paste-10 mask+0.5: 0(0,0)
  Keep-Out Layer circle w0.01: c0,0 r1
GPS05605 [mm] "SOT343, 4-Leads, Body 2,00x2,15mm, Pitch 1,30mm, IPC High Density"
  rect 0.5x0.35 smd: 1(-1.05,0.65) 3(1.05,-0.65) 4(1.05,0.65)
  rect 0.5x0.65 smd: 2(-1.05,-0.5)
  silkscreen extent -1.1,-1 0.65,1.17, body extent -1.22,-1 1.23,1, height 0.9
HMC472ALP4E [mm] "24-VFQFN Exposed Pad"
  rect 0.35x0.25 smd: 1(-1.825,1.25) 2(-1.825,0.75) 3(-1.825,0.25) 4(-1.825,-0.25) 5(-1.825,-0.75) 6(-1.825,-1.25) 13(1.825,-1.25) 14(1.825,-0.75) 15(1.825,-0.25) 16(1.825,0.25) 17(1.825,0.75) 18(1.825,1.25)
  rect 0.25x0.35 smd: 7(-1.25,-1.825) 8(-0.75,-1.825) 9(-0.25,-1.825) 10(0.25,-1.825) 11(0.75,-1.825) 12(1.25,-1.825) 19(1.25,1.825) 20(0.75,1.825) 21(0.25,1.825) 22(-0.25,1.825) 23(-0.75,1.825) 24(-1.25,1.825)
  rect 2.8x2.8 smd: 25(0,0)
  silkscreen extent -2.82,-2.05 2.05,2.05, body extent -2.05,-2.05 2.05,2.05, height 0.39
INA226 [mm] "TSSOP, 10-Leads, Body 3,00x3,00mm, Pitch 0,50mm, IPC Medium Density"
  rect 1.45x0.3 smd: 1(-2.2,1) 2(-2.2,0.5) 3(-2.2,0) 4(-2.2,-0.5) 5(-2.2,-1) 6(2.2,-1) 7(2.2,-0.5) 8(2.2,0) 9(2.2,0.5) 10(2.2,1)
  silkscreen extent -2.32,-1.55 1.15,1.83, body extent -2.45,-1.55 2.45,1.55, height 1.1
"IND 0402/1005 RF WW" [mm] "Chip Inductor, 2-Leads, Body 1.00x0.50mm, IPC High Density"
  rect 0.48x0.54 smd: 1(-0.44,0) 2(0.44,0)
  silkscreen extent -0.87,-0.45 0.87,0.45, body extent -0.5,-0.29 0.5,0.29, height 0.51
"LED 0603/1608 GREEN" [mm] "Chip Diode, 2-Leads, Body 1.60x0.80mm, IPC Medium Density"
  rect 0.8x0.8 smd: 1(-0.75,0) 2(0.75,0)
  silkscreen extent -1.52,-0.7 1.52,0.7, body extent -0.8,-0.4 0.8,0.4, height 0.53
LMK04610 [mm] "PQFN, 56-Leads, Body 8,00x8,00mm, Pitch 0,50mm, Thermal Pad 5,70x5,70mm, IPC High Density"
  rect 0.6x0.24 smd: 1(-3.9,3.25) 2(-3.9,2.75) 3(-3.9,2.25) 4(-3.9,1.75) 5(-3.9,1.25) 6(-3.9,0.75) 7(-3.9,0.25) 8(-3.9,-0.25) 9(-3.9,-0.75) 10(-3.9,-1.25) 11(-3.9,-1.75) 12(-3.9,-2.25) 13(-3.9,-2.75) 14(-3.9,-3.25) 29(3.9,-3.25) 30(3.9,-2.75) 31(3.9,-2.25) 32(3.9,-1.75) 33(3.9,-1.25) 34(3.9,-0.75) 35(3.9,-0.25) 36(3.9,0.25) 37(3.9,0.75) 38(3.9,1.25) 39(3.9,1.75) 40(3.9,2.25) 41(3.9,2.75) 42(3.9,3.25)
  rect 0.24x0.6 smd: 15(-3.25,-3.9) 16(-2.75,-3.9) 17(-2.25,-3.9) 18(-1.75,-3.9) 19(-1.25,-3.9) 20(-0.75,-3.9) 21(-0.25,-3.9) 22(0.25,-3.9) 23(0.75,-3.9) 24(1.25,-3.9) 25(1.75,-3.9) 26(2.25,-3.9) 27(2.75,-3.9) 28(3.25,-3.9) 43(3.25,3.9) 44(2.75,3.9) 45(2.25,3.9) 46(1.75,3.9) 47(1.25,3.9) 48(0.75,3.9) 49(0.25,3.9) 50(-0.25,3.9) 51(-0.75,3.9) 52(-1.25,3.9) 53(-1.75,3.9) 54(-2.25,3.9) 55(-2.75,3.9) 56(-3.25,3.9)
  rect 5.7x5.7 smd paste-2.85 mask+0.102: 57(0,0)
  rect 1.15x1.15 on Bottom Paste: ""(-2.025,-2.025) ""(-2.025,-0.675) ""(-2.025,0.675) ""(-2.025,2.025) ""(-0.675,-2.025) ""(-0.675,-0.675) ""(-0.675,0.675) ""(-0.675,2.025) ""(0.675,-2.025) ""(0.675,-0.675) ""(0.675,0.675) ""(0.675,2.025) ""(2.025,-2.025) ""(2.025,-0.675) ""(2.025,0.675) ""(2.025,2.025)
  silkscreen extent -4.85,-4.08 4.08,4.08, body extent -4.07,-4.08 4.08,4.07, height 1
LP3878-ADJ [mm] "SDC08A"
  rect 0.6x0.3 smd: 1(-1.9,1.2) 2(-1.9,0.4) 3(-1.9,-0.4) 4(-1.9,-1.2) 5(1.9,-1.2) 6(1.9,-0.4) 7(1.9,0.4) 8(1.9,1.2)
  rect 2.6x3 smd: 9(0,0)
  silkscreen extent -2.6,-2.15 2.15,2.2, body extent -2,-2 2,2, height 0.8
LP5900 [mm] "PSON, 6-Leads, Body 2.10x2.50mm, Pitch 0.65mm, Thermal Pad 1.20x0.75mm, IPC High Density"
  rect 0.6x0.25 smd: 1(-1.15,0.65) 2(-1.15,0) 3(-1.15,-0.65) 4(1.15,-0.65) 5(1.15,0) 6(1.15,0.65)
  rect 0.75x1.2 smd: 7(0,0)
  silkscreen extent -1.85,-1.2 1.4,1.25, body extent -1.25,-1.05 1.25,1.05, height 0.8
LT3504 [mm] "UFD Package  28-Lead Plastic QFN (4mm × 5mm)  (Reference LTC DWG # 05-08-1712 Rev B)"
  rect 0.7x0.25 smd: 1(-1.9,1.75) 2(-1.9,1.25) 3(-1.9,0.75) 4(-1.9,0.25) 5(-1.9,-0.25) 6(-1.9,-0.75) 7(-1.9,-1.25) 8(-1.9,-1.75) 15(1.9,-1.75) 16(1.9,-1.25) 17(1.9,-0.75) 18(1.9,-0.25) 19(1.9,0.25) 20(1.9,0.75) 21(1.9,1.25) 22(1.9,1.75)
  rect 0.25x0.7 smd: 9(-1.25,-2.4) 10(-0.75,-2.4) 11(-0.25,-2.4) 12(0.25,-2.4) 13(0.75,-2.4) 14(1.25,-2.4) 23(1.25,2.4) 24(0.75,2.4) 25(0.25,2.4) 26(-0.25,2.4) 27(-0.75,2.4) 28(-1.25,2.4)
  rect 2.65x3.65 smd: 29(0,0)
  silkscreen extent -2.82,-2.55 2.05,2.55, body extent -2.05,-2.55 2.05,2.55, height 0.8
MABA-007681-CT2010 [mm] "MABA-007681-CT2010"
  rect 2.4x1.27 smd: 1(-2.725,2.54) 2(-2.725,-2.54) 3(2.725,-2.54) 4(2.725,2.54)
  silkscreen extent -2.92,-3.33 2.44,3.48, body extent -3.17,-3.55 3.18,3.55, height 1.85
MABAES0060 [mm] "SOTFL, 5-Leads, Body 3.81x2.81mm, Pitch 1.27mm, IPC High Density"
  rect 1.4x0.76 smd: 1(-1.715,1.27) 2(-1.715,0) 3(-1.715,-1.27) 4(1.715,-1.27) 5(1.715,1.27)
  silkscreen extent -1.84,-1.9 1.4,2.32, body extent -1.4,-1.9 1.41,1.9, height 2.8
MADP-011029-14150 [mm] "PSON, 6-Leads, Body 1,20x1,50mm, Pitch 0,40mm, Thermal Pad 0,85x0,47mm, IPC High Density"
  rect 0.34x0.25 smd: 1(-0.6,0.4) 2(-0.6,0) 3(-0.6,-0.4) 4(0.6,-0.4) 5(0.6,0) 6(0.6,0.4)
  rect 0.47x0.85 smd: 7(0,0)
  silkscreen extent -1.03,0.69 -0.93,0.79, body extent -0.75,-0.6 0.75,0.6, height 0.8